# Altium PCB USB-PD-240W-PCB.PcbDoc (part 1 of 3)
Units mil, origin at the board's own origin, x right, y up, seen from the top; angles counter-clockwise.
Board outline 3858.27 x 2834.65 mil, 6 copper layers (L1 Top, L2 GND, L3 Power, L4 Power, L5 GND, L6 Bottom), stack 61.496 mil thick; 154 components, 83 nets, 633 pads, 831 vias.
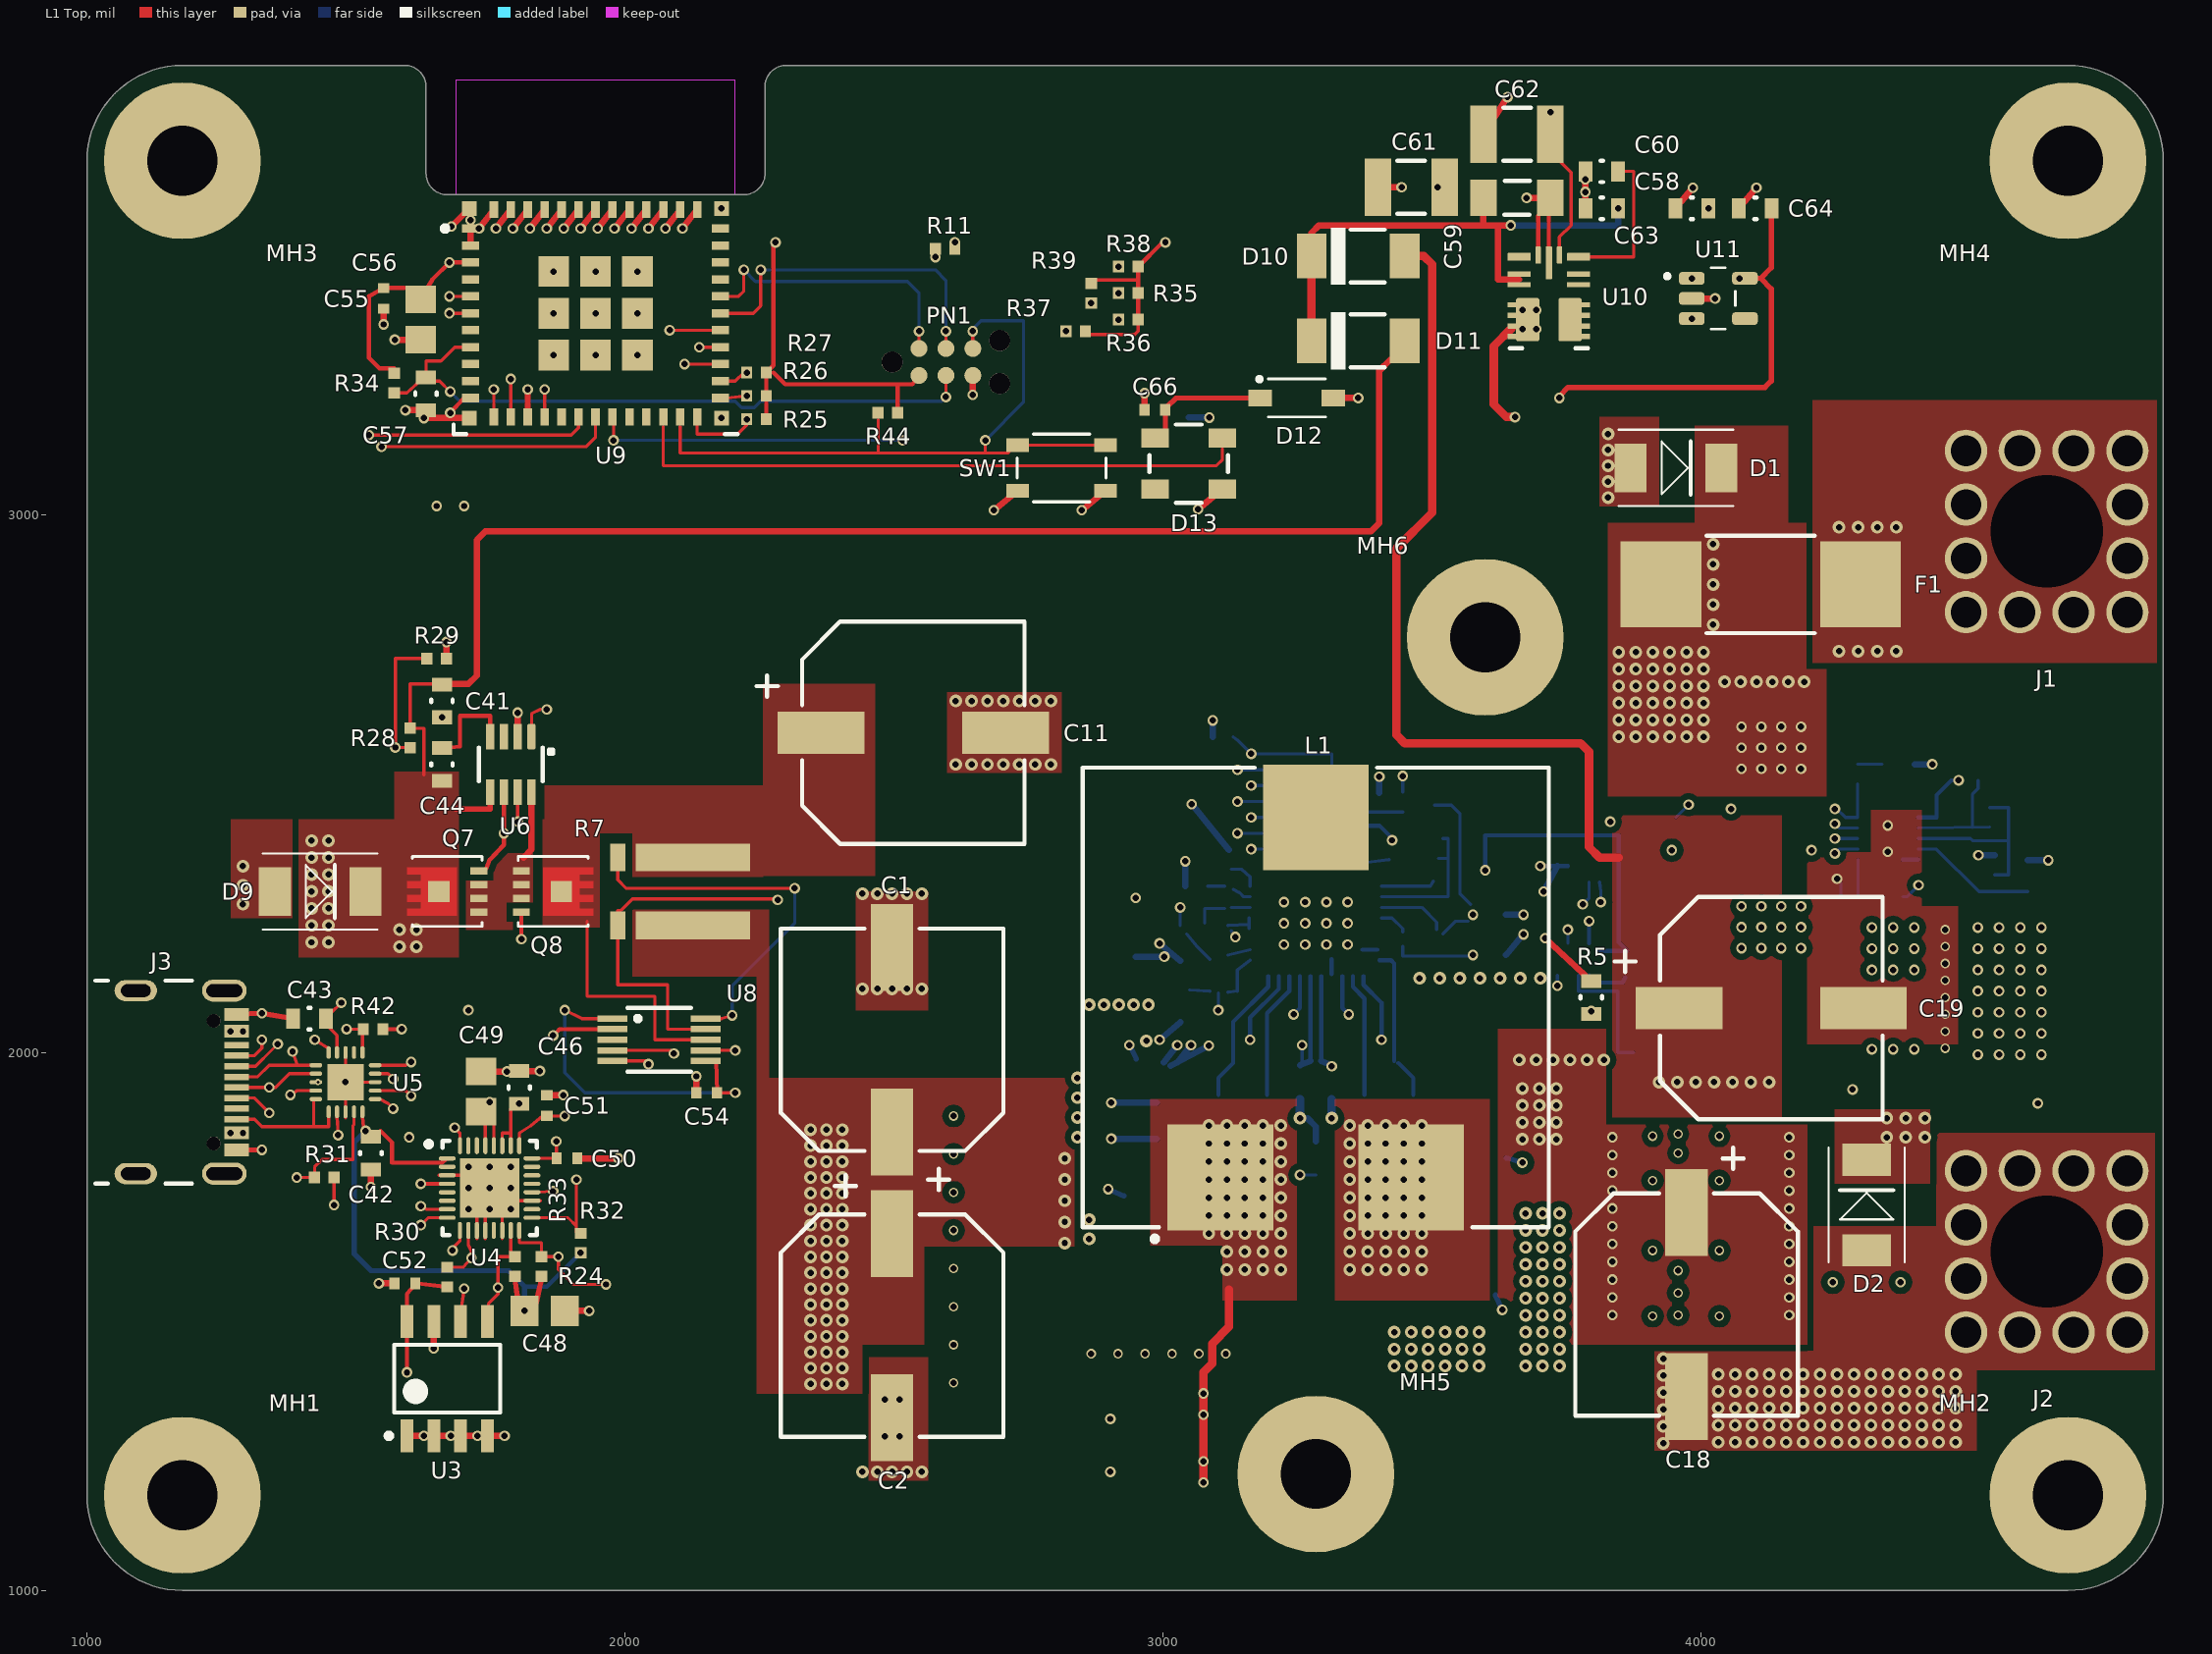
[diagram p0: L1 Top view]
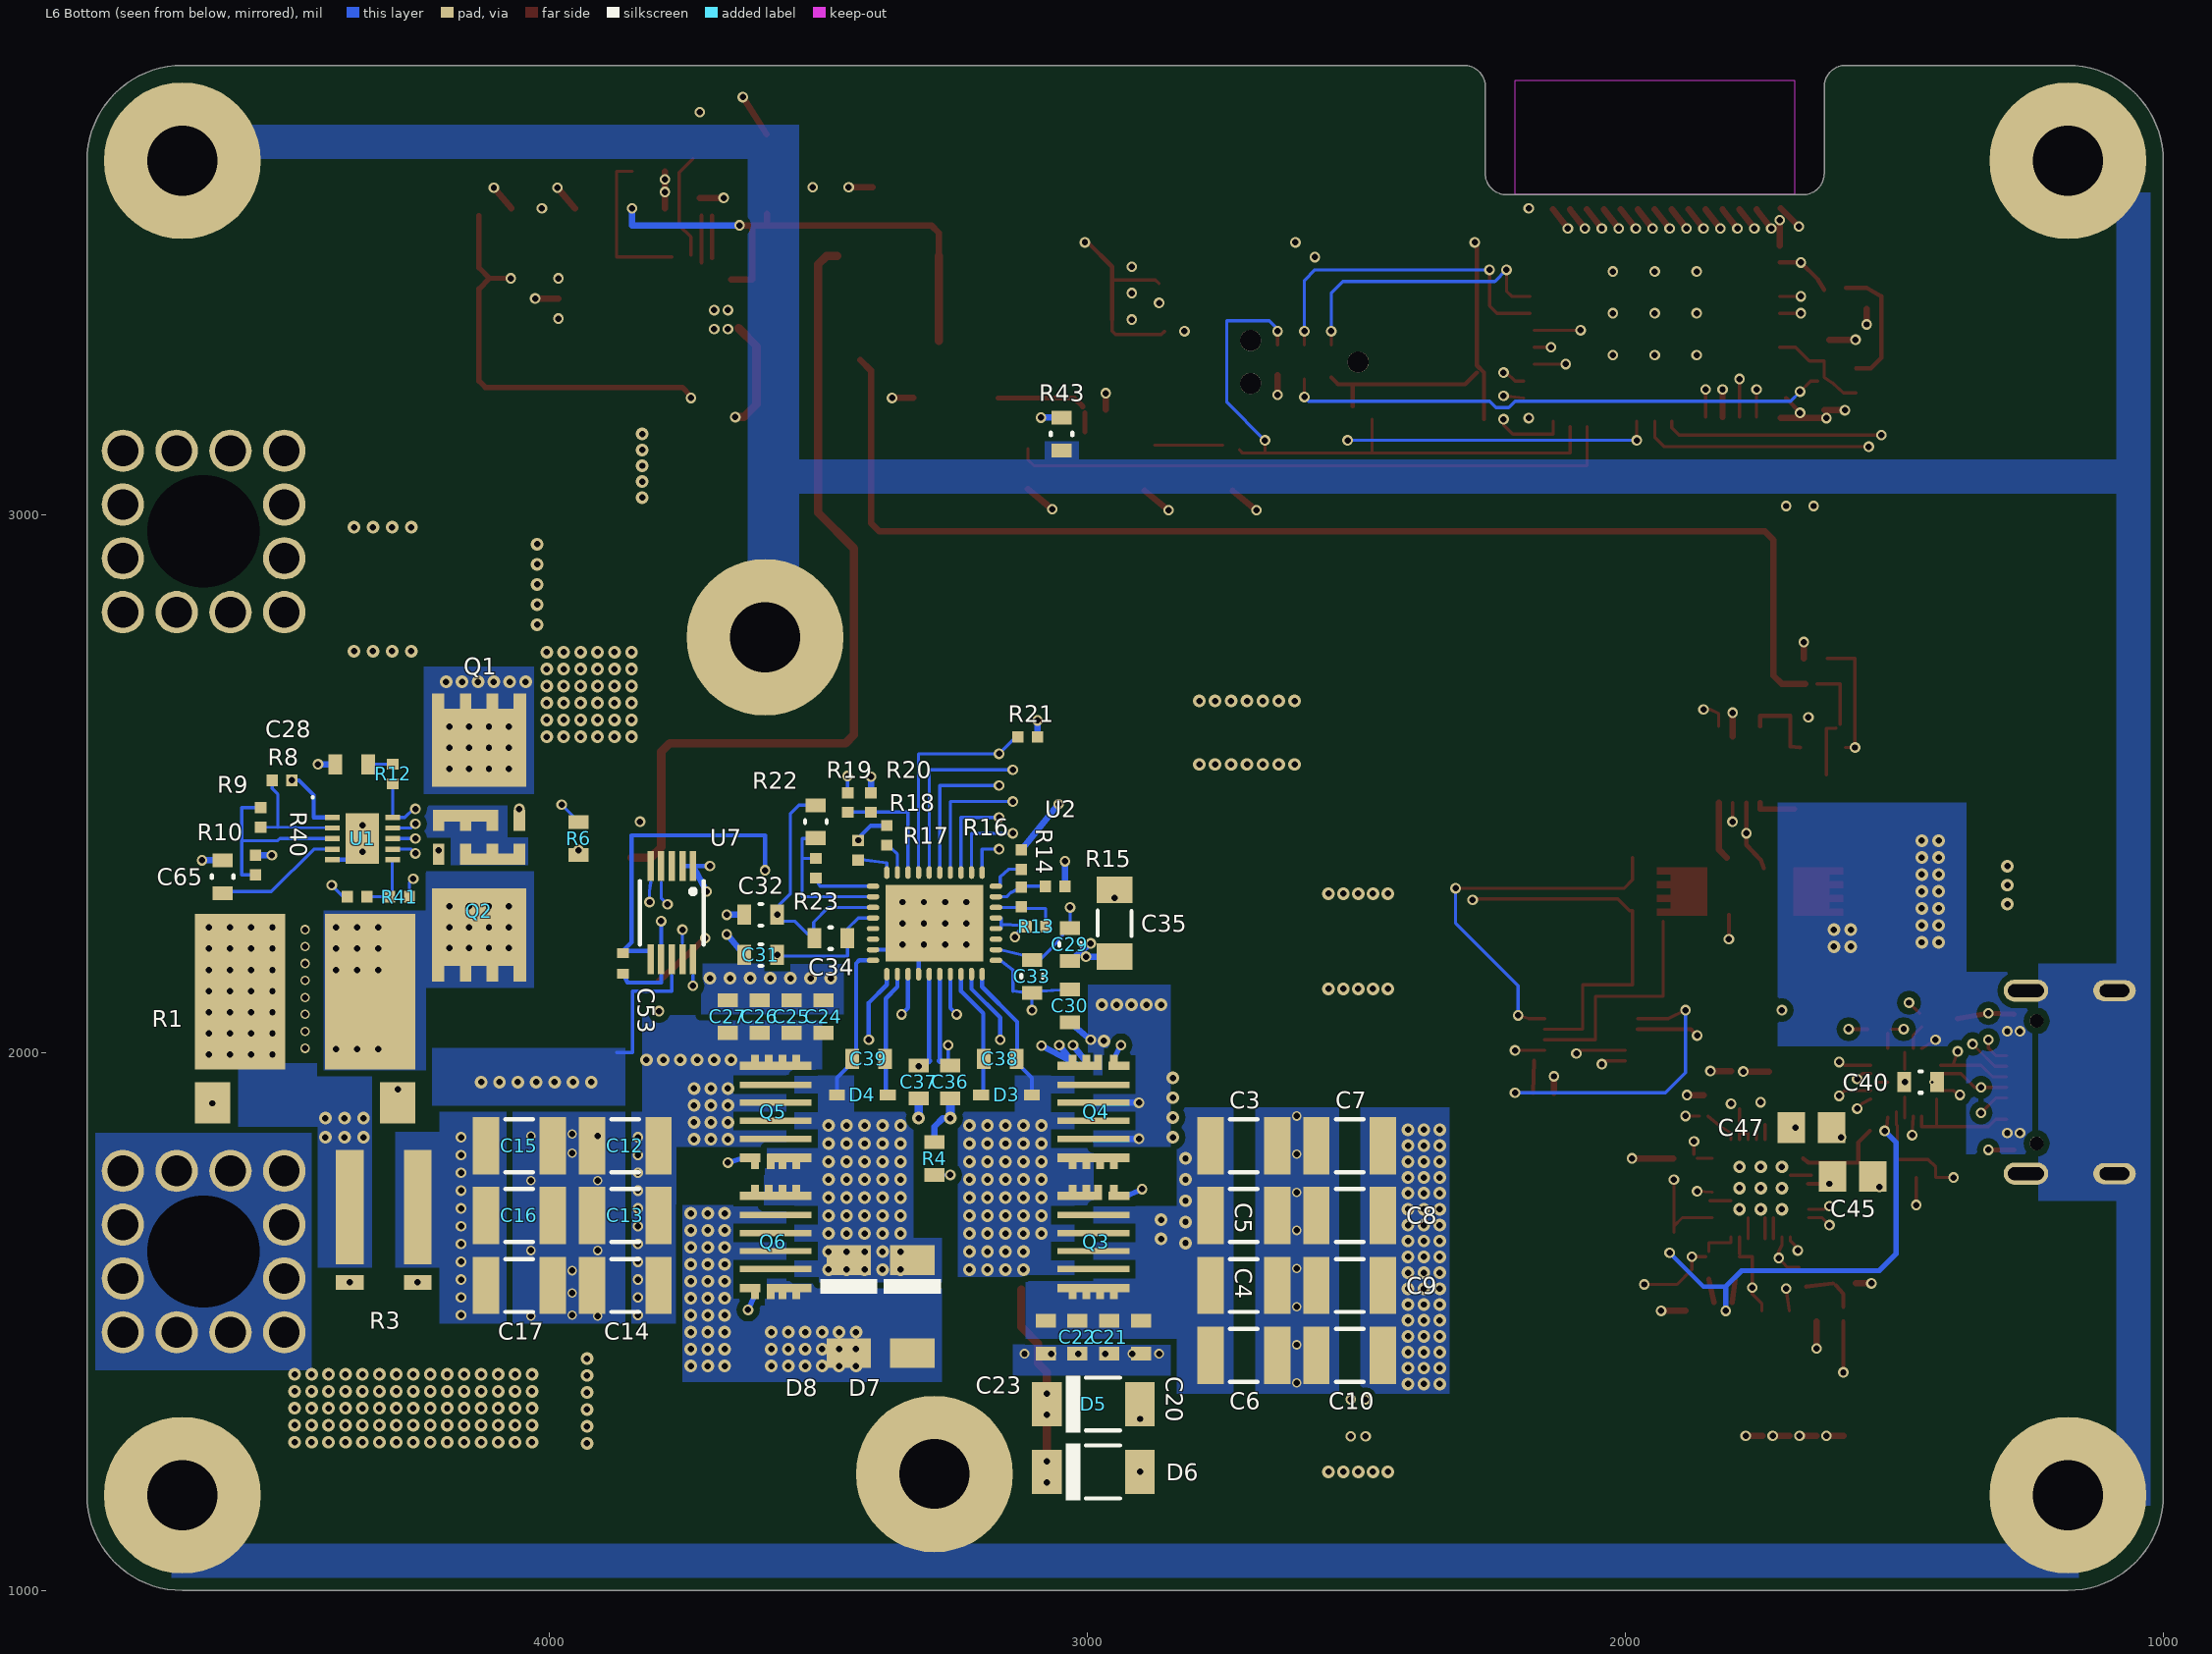
[diagram p1: L6 Bottom view, seen from below]
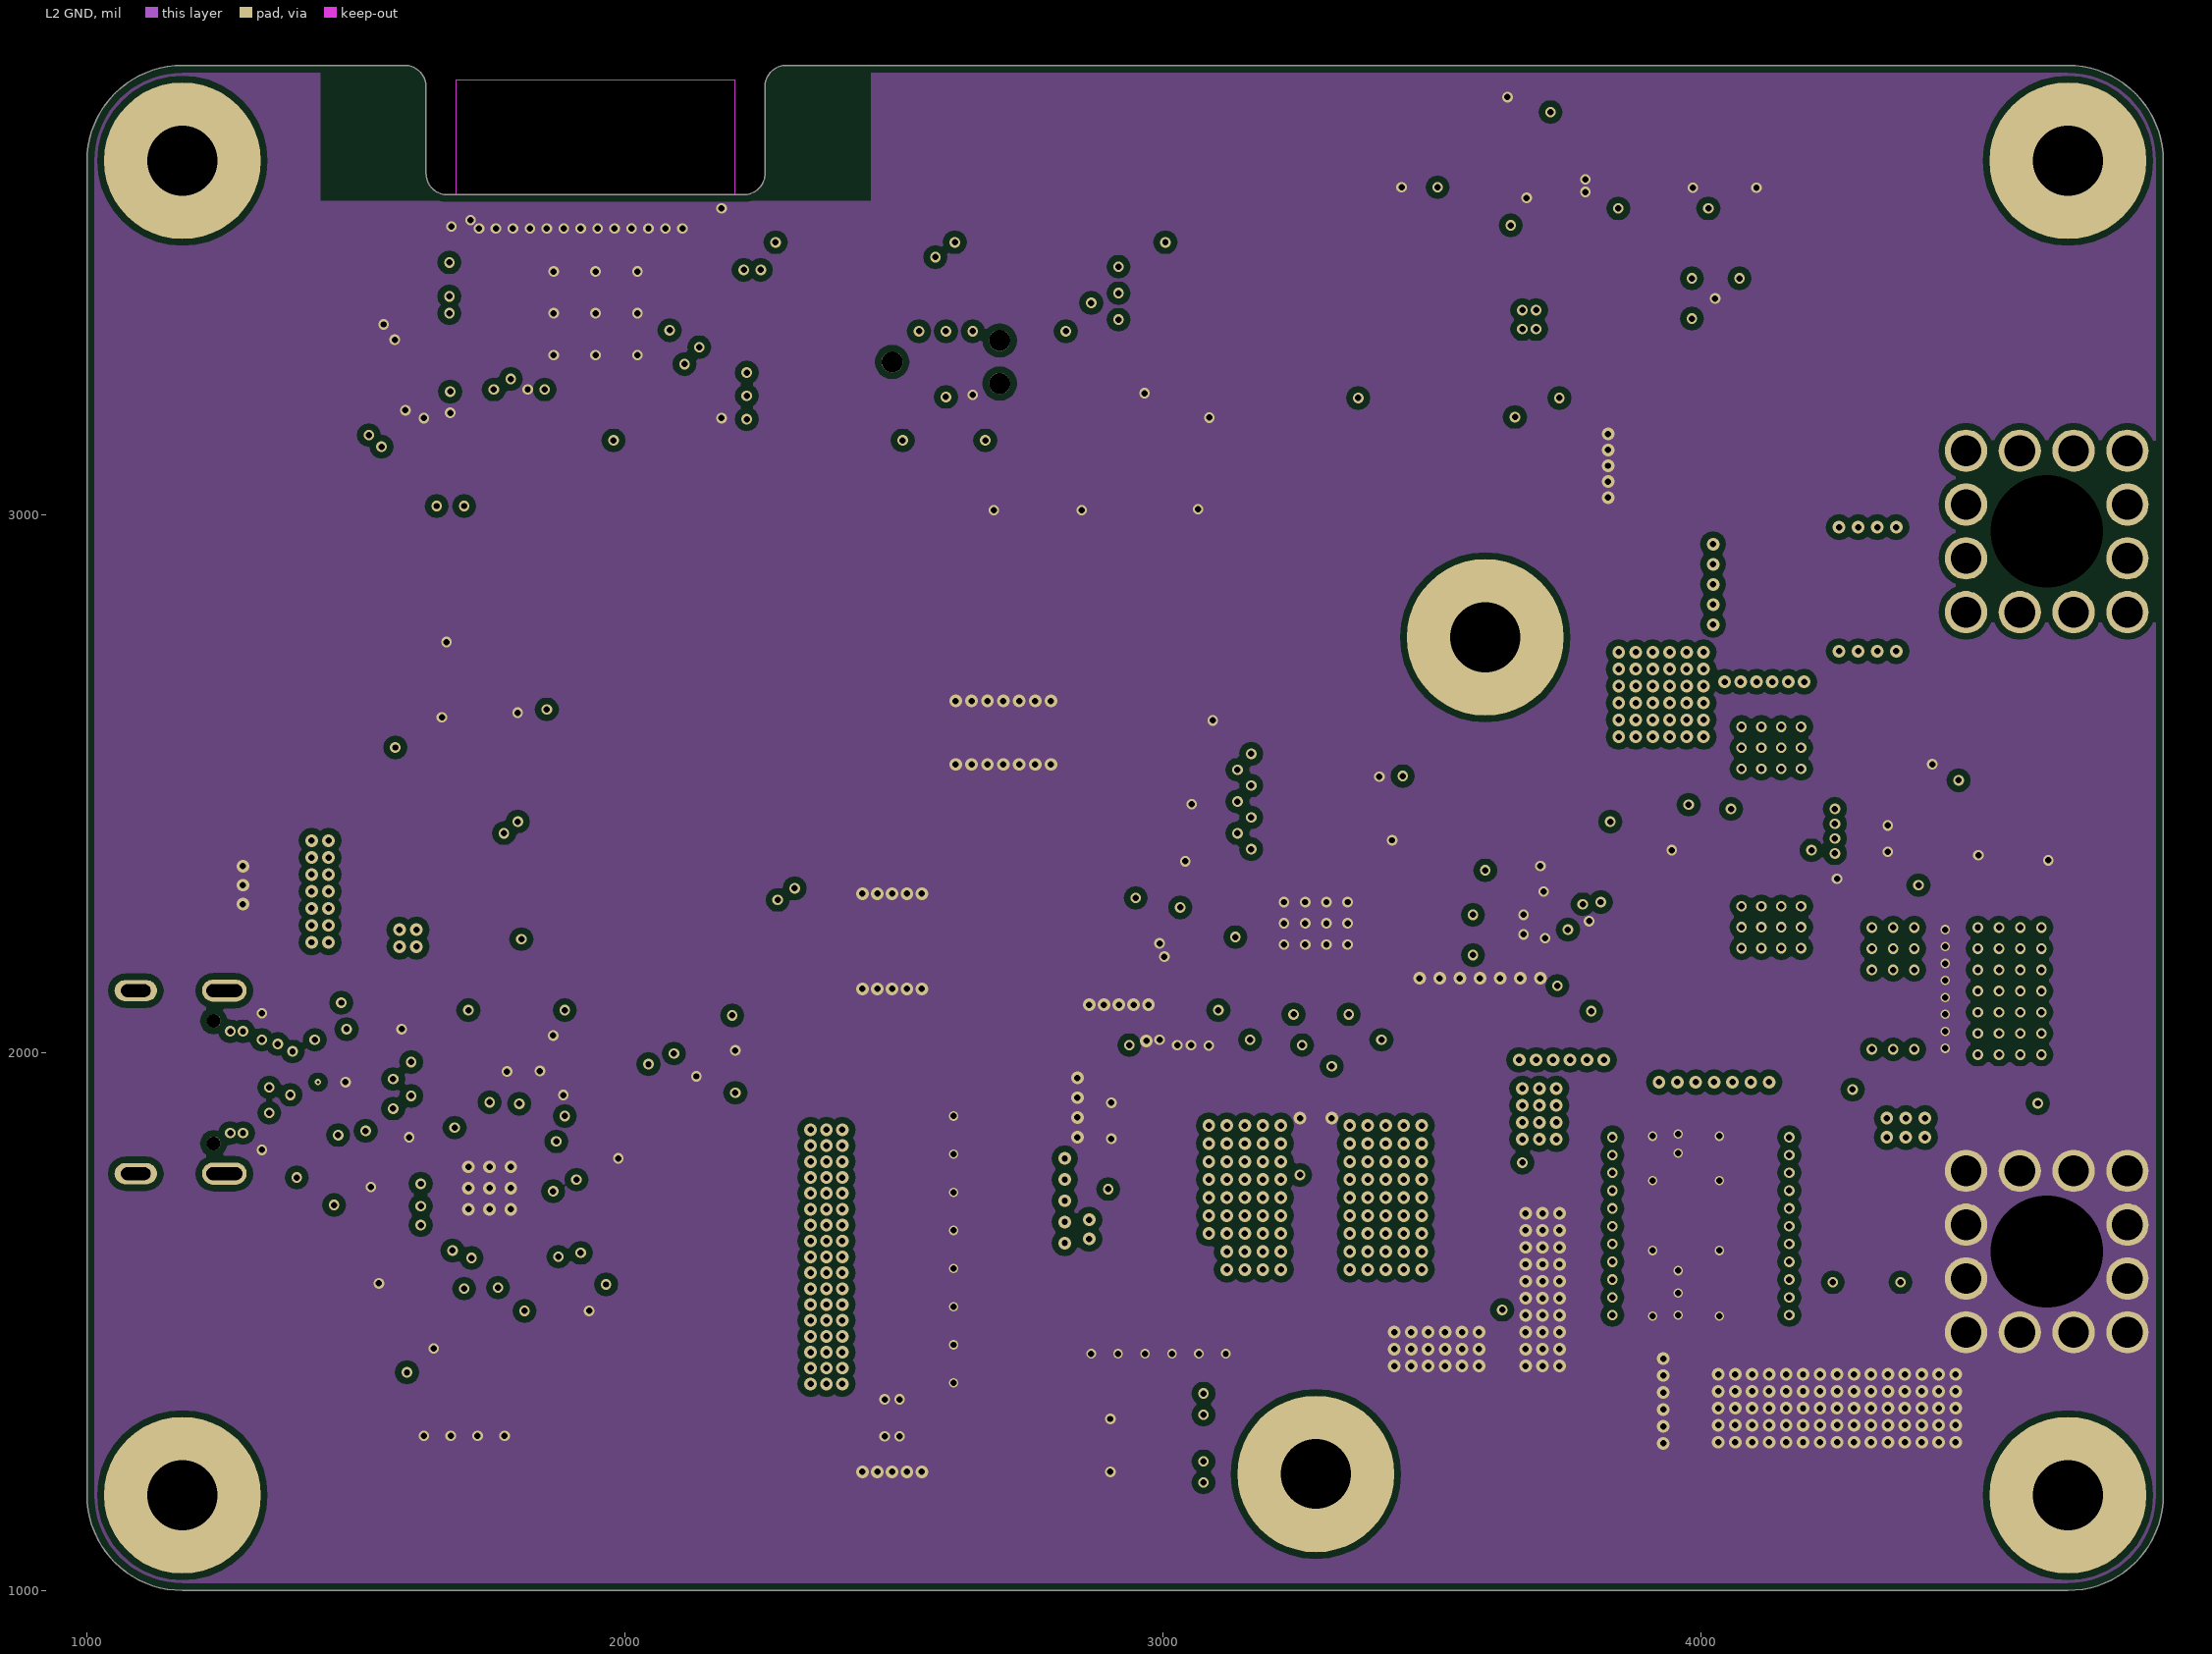
[diagram p2: L2 GND]
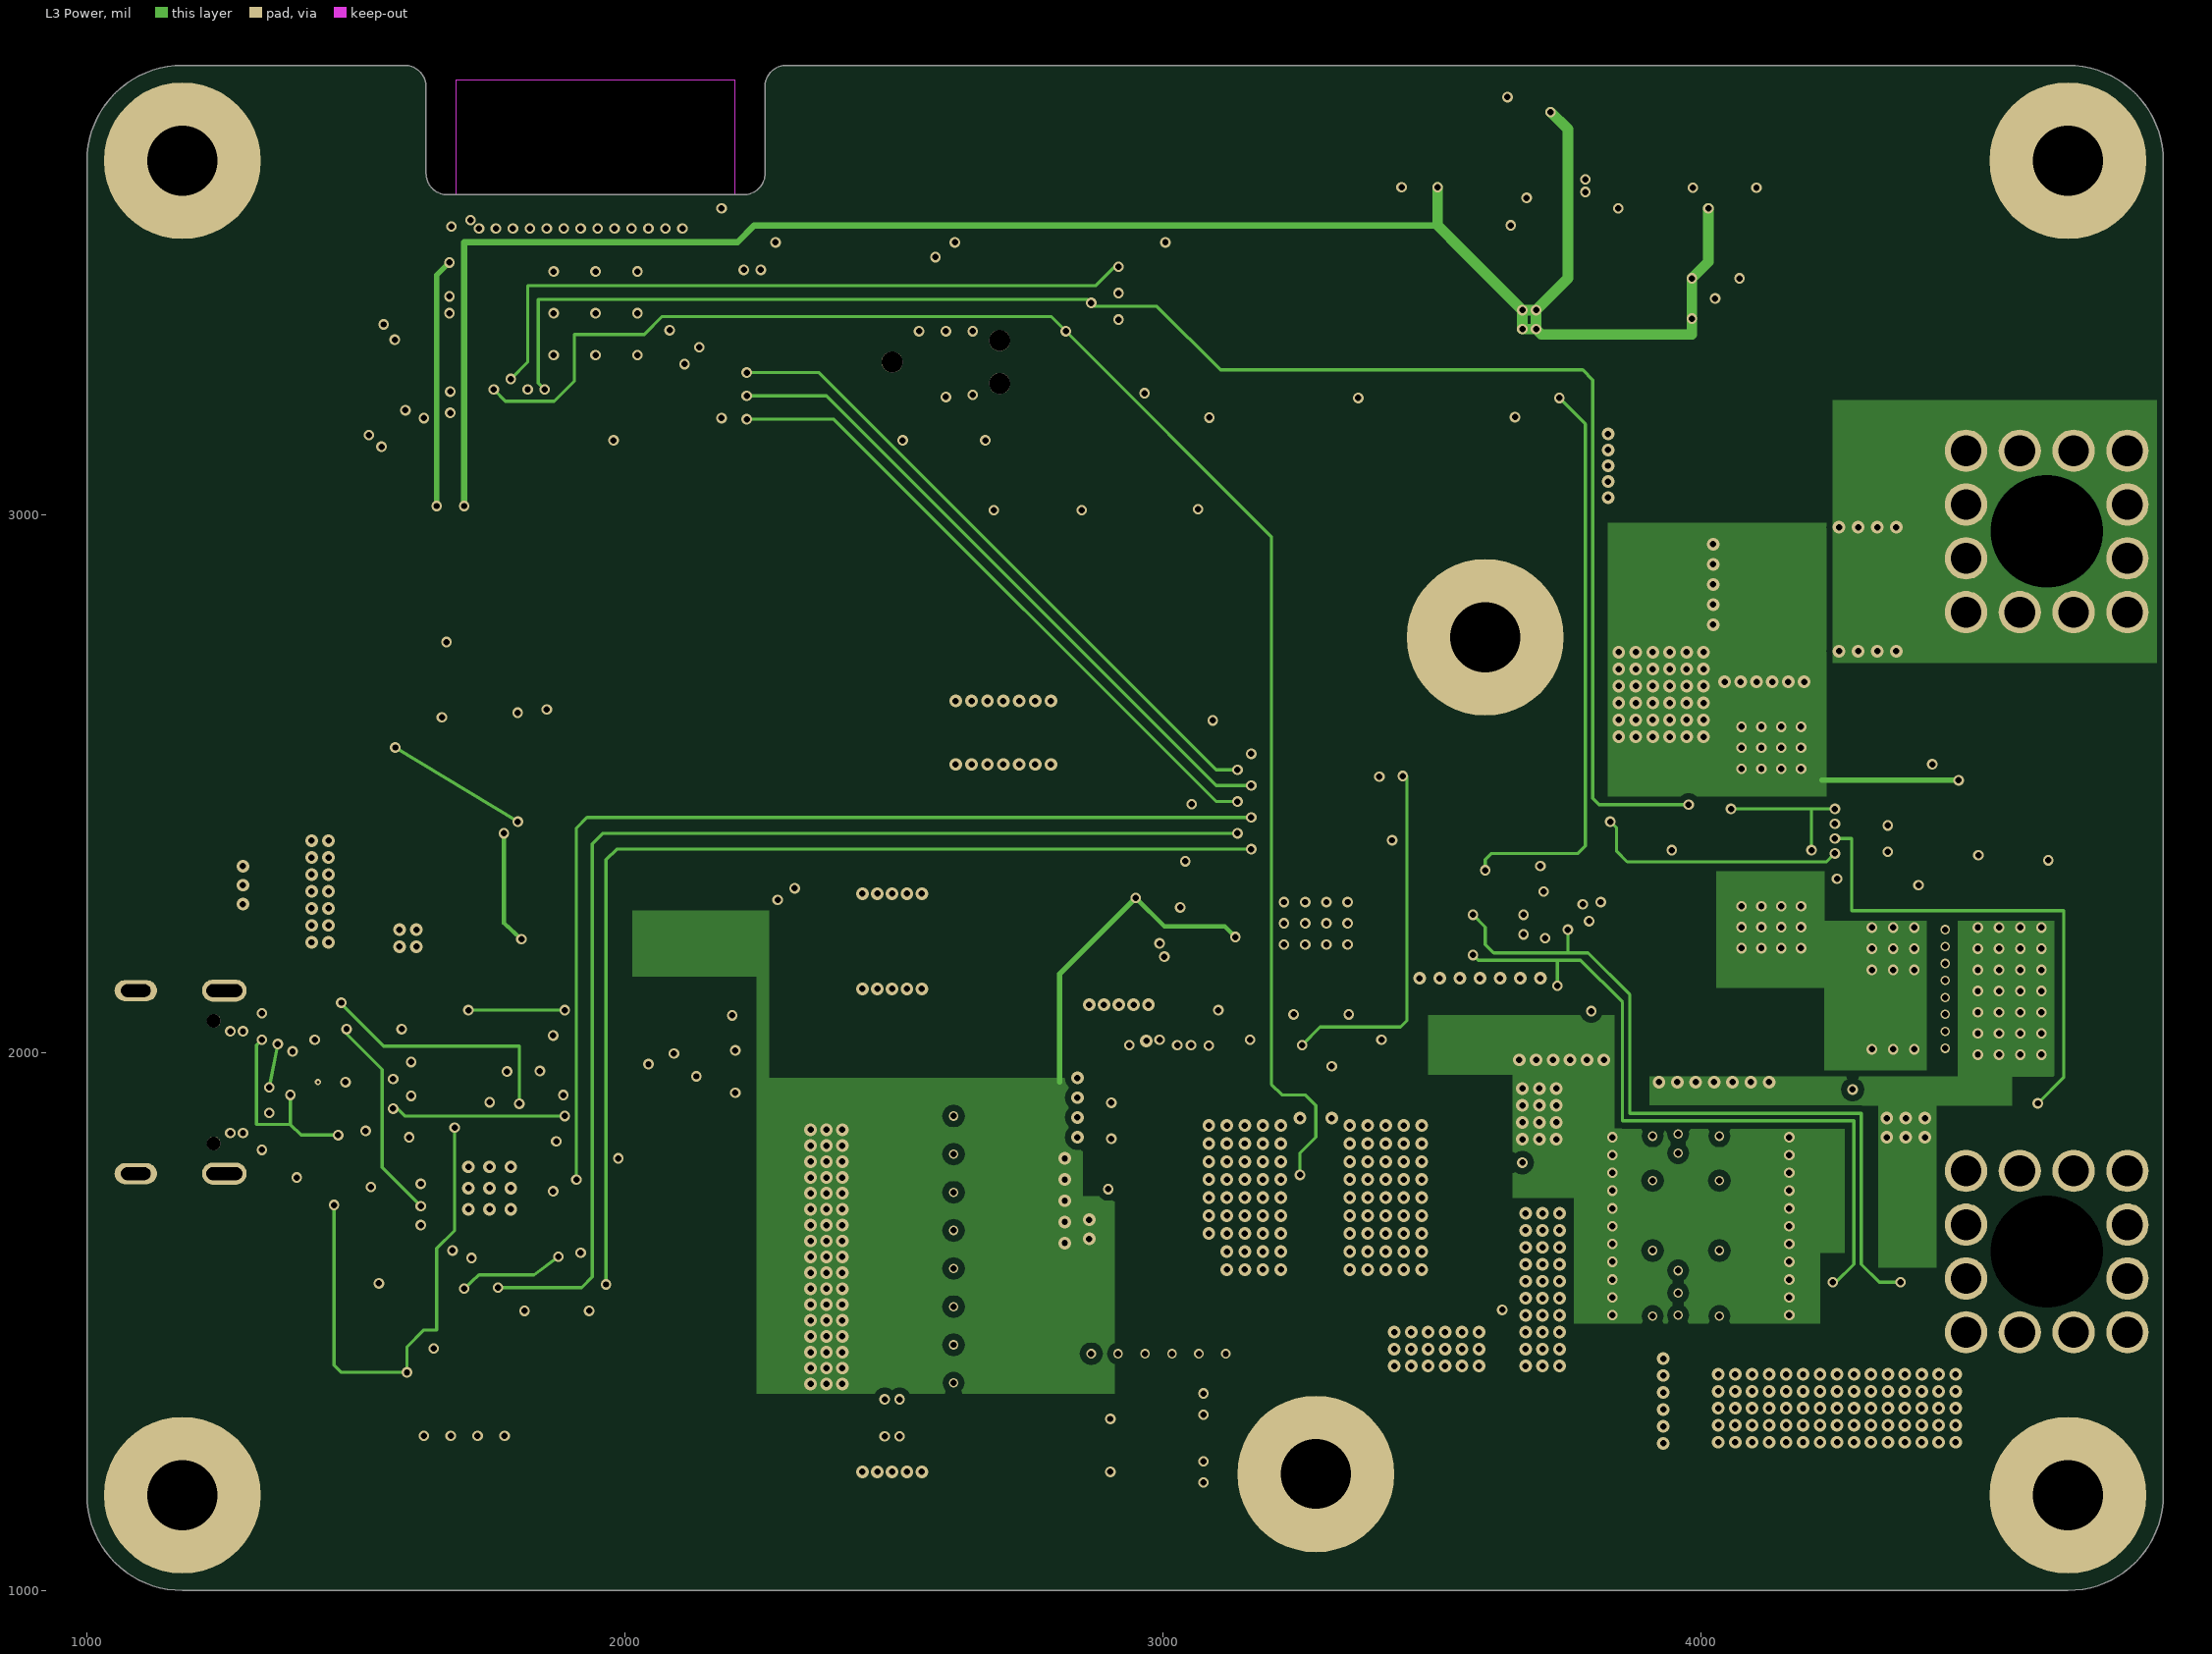
[diagram p3: L3 Power]
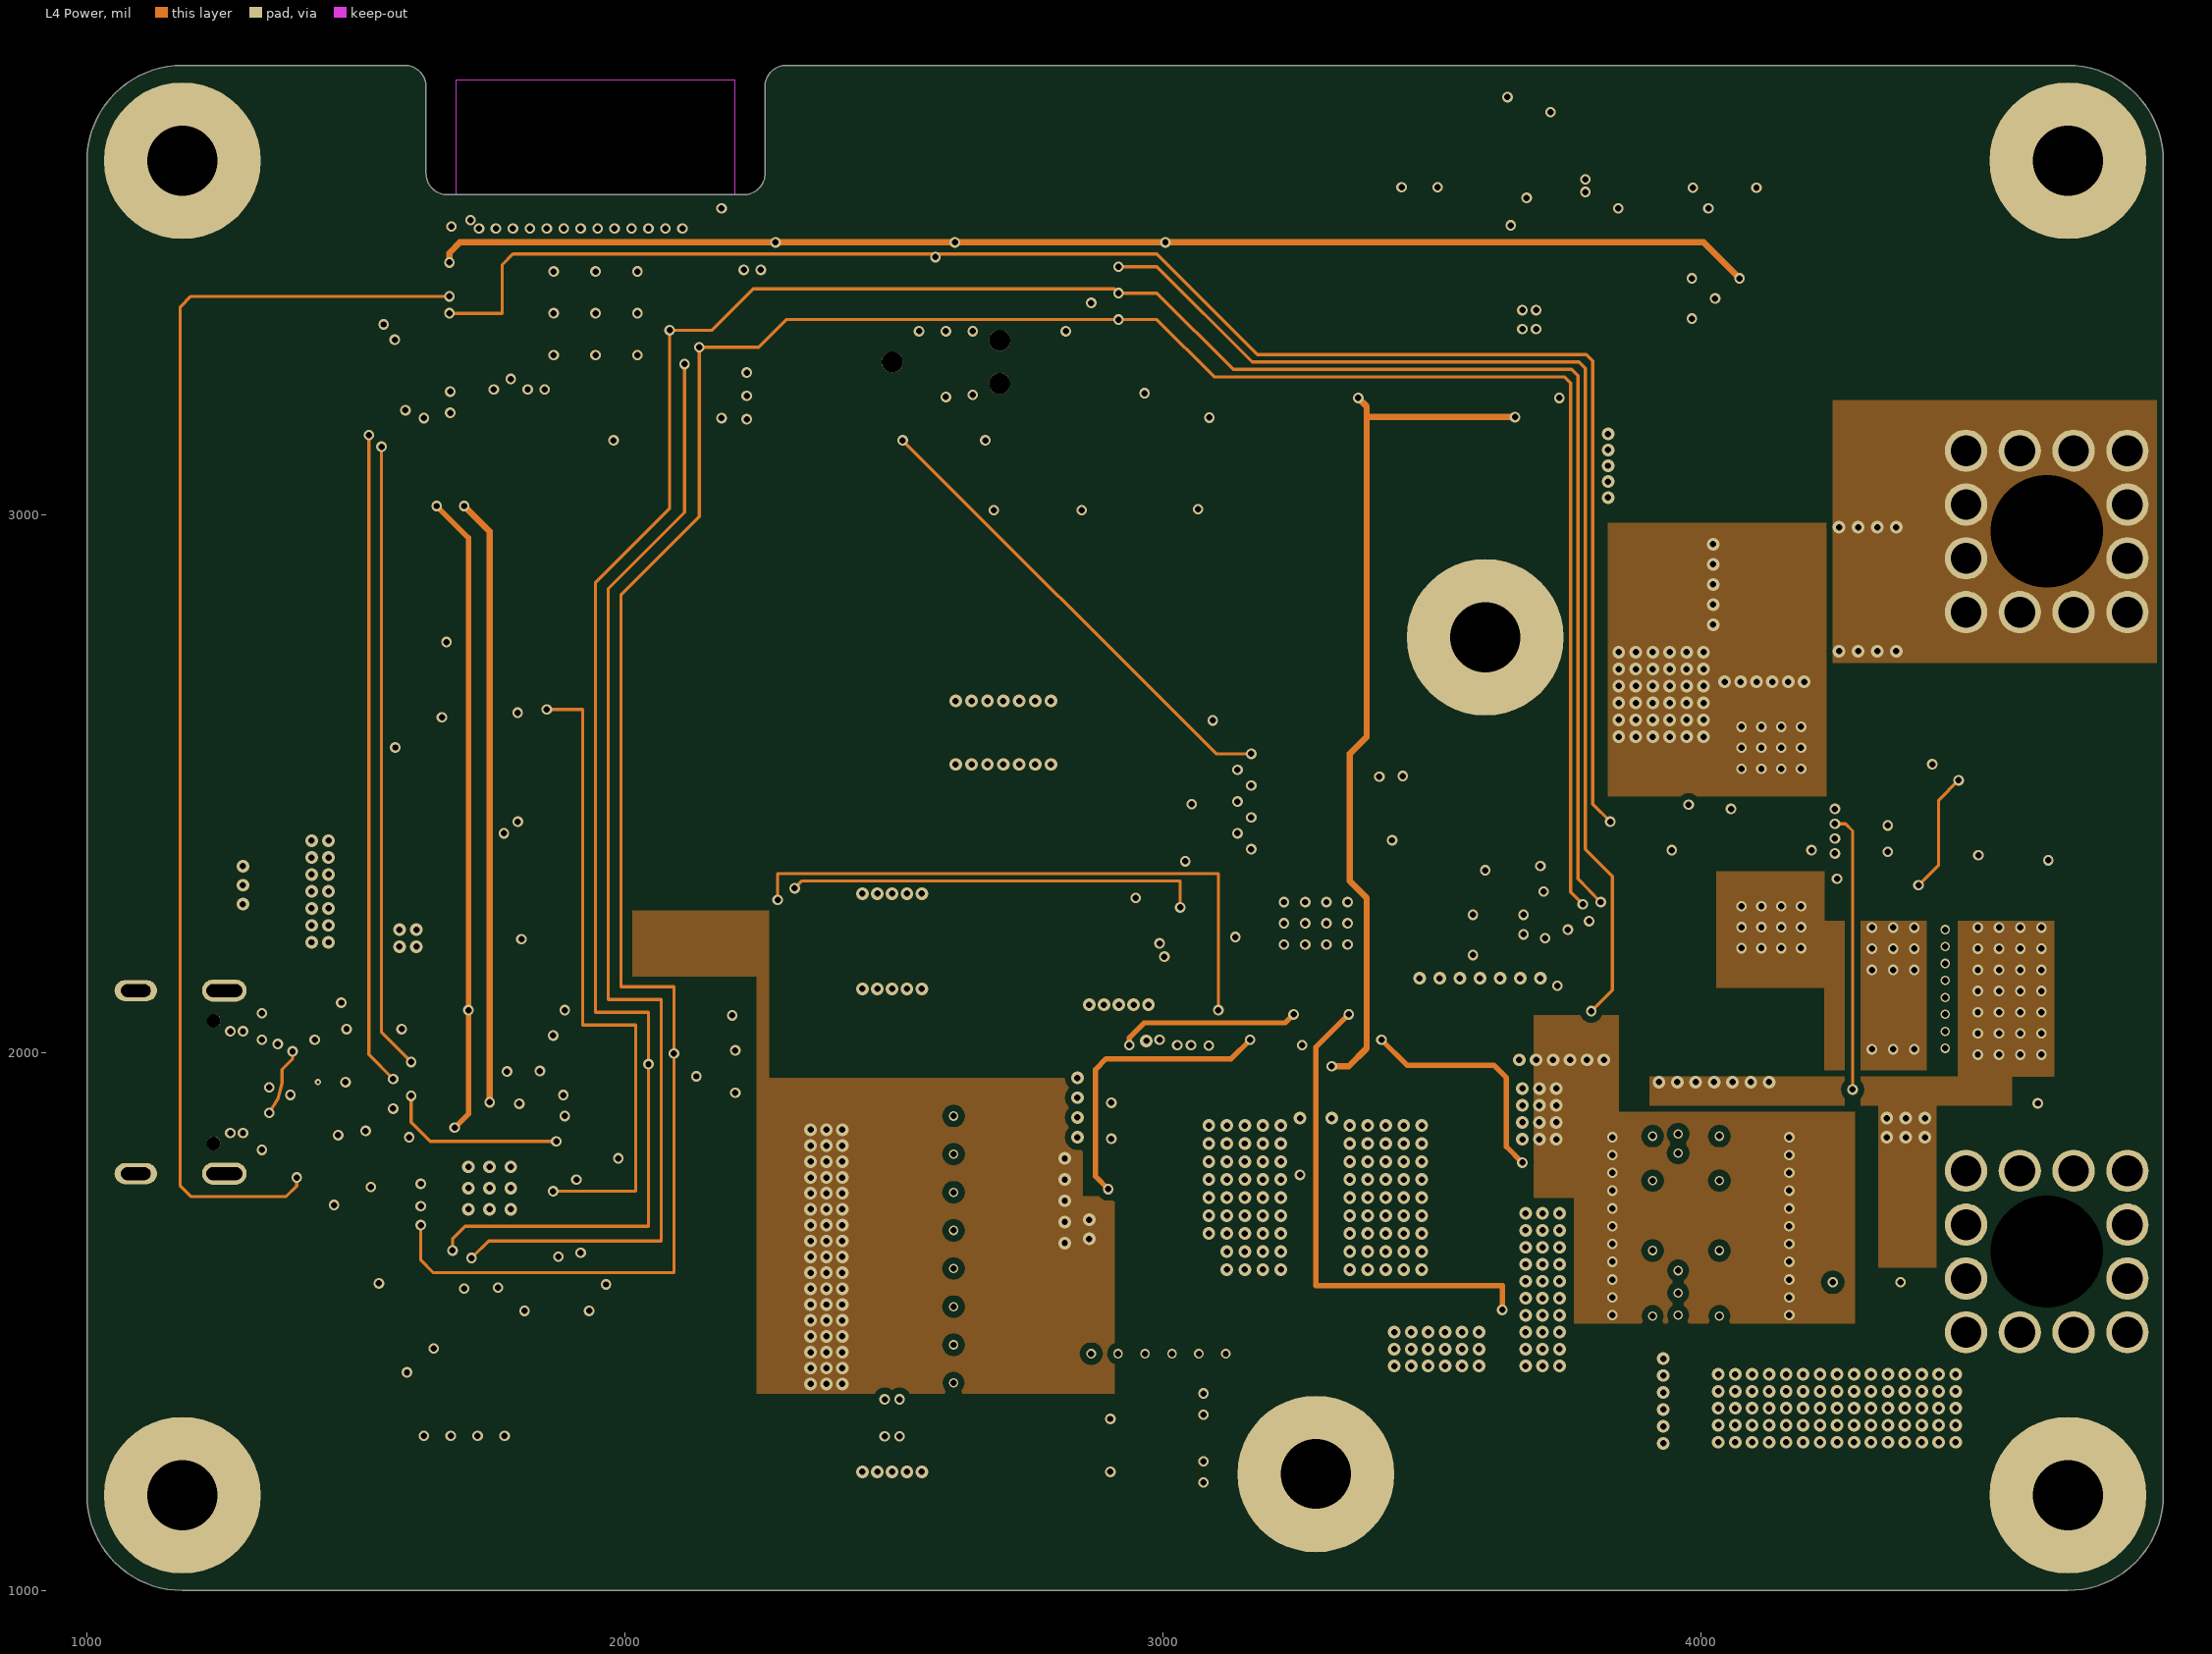
[diagram p4: L4 Power]
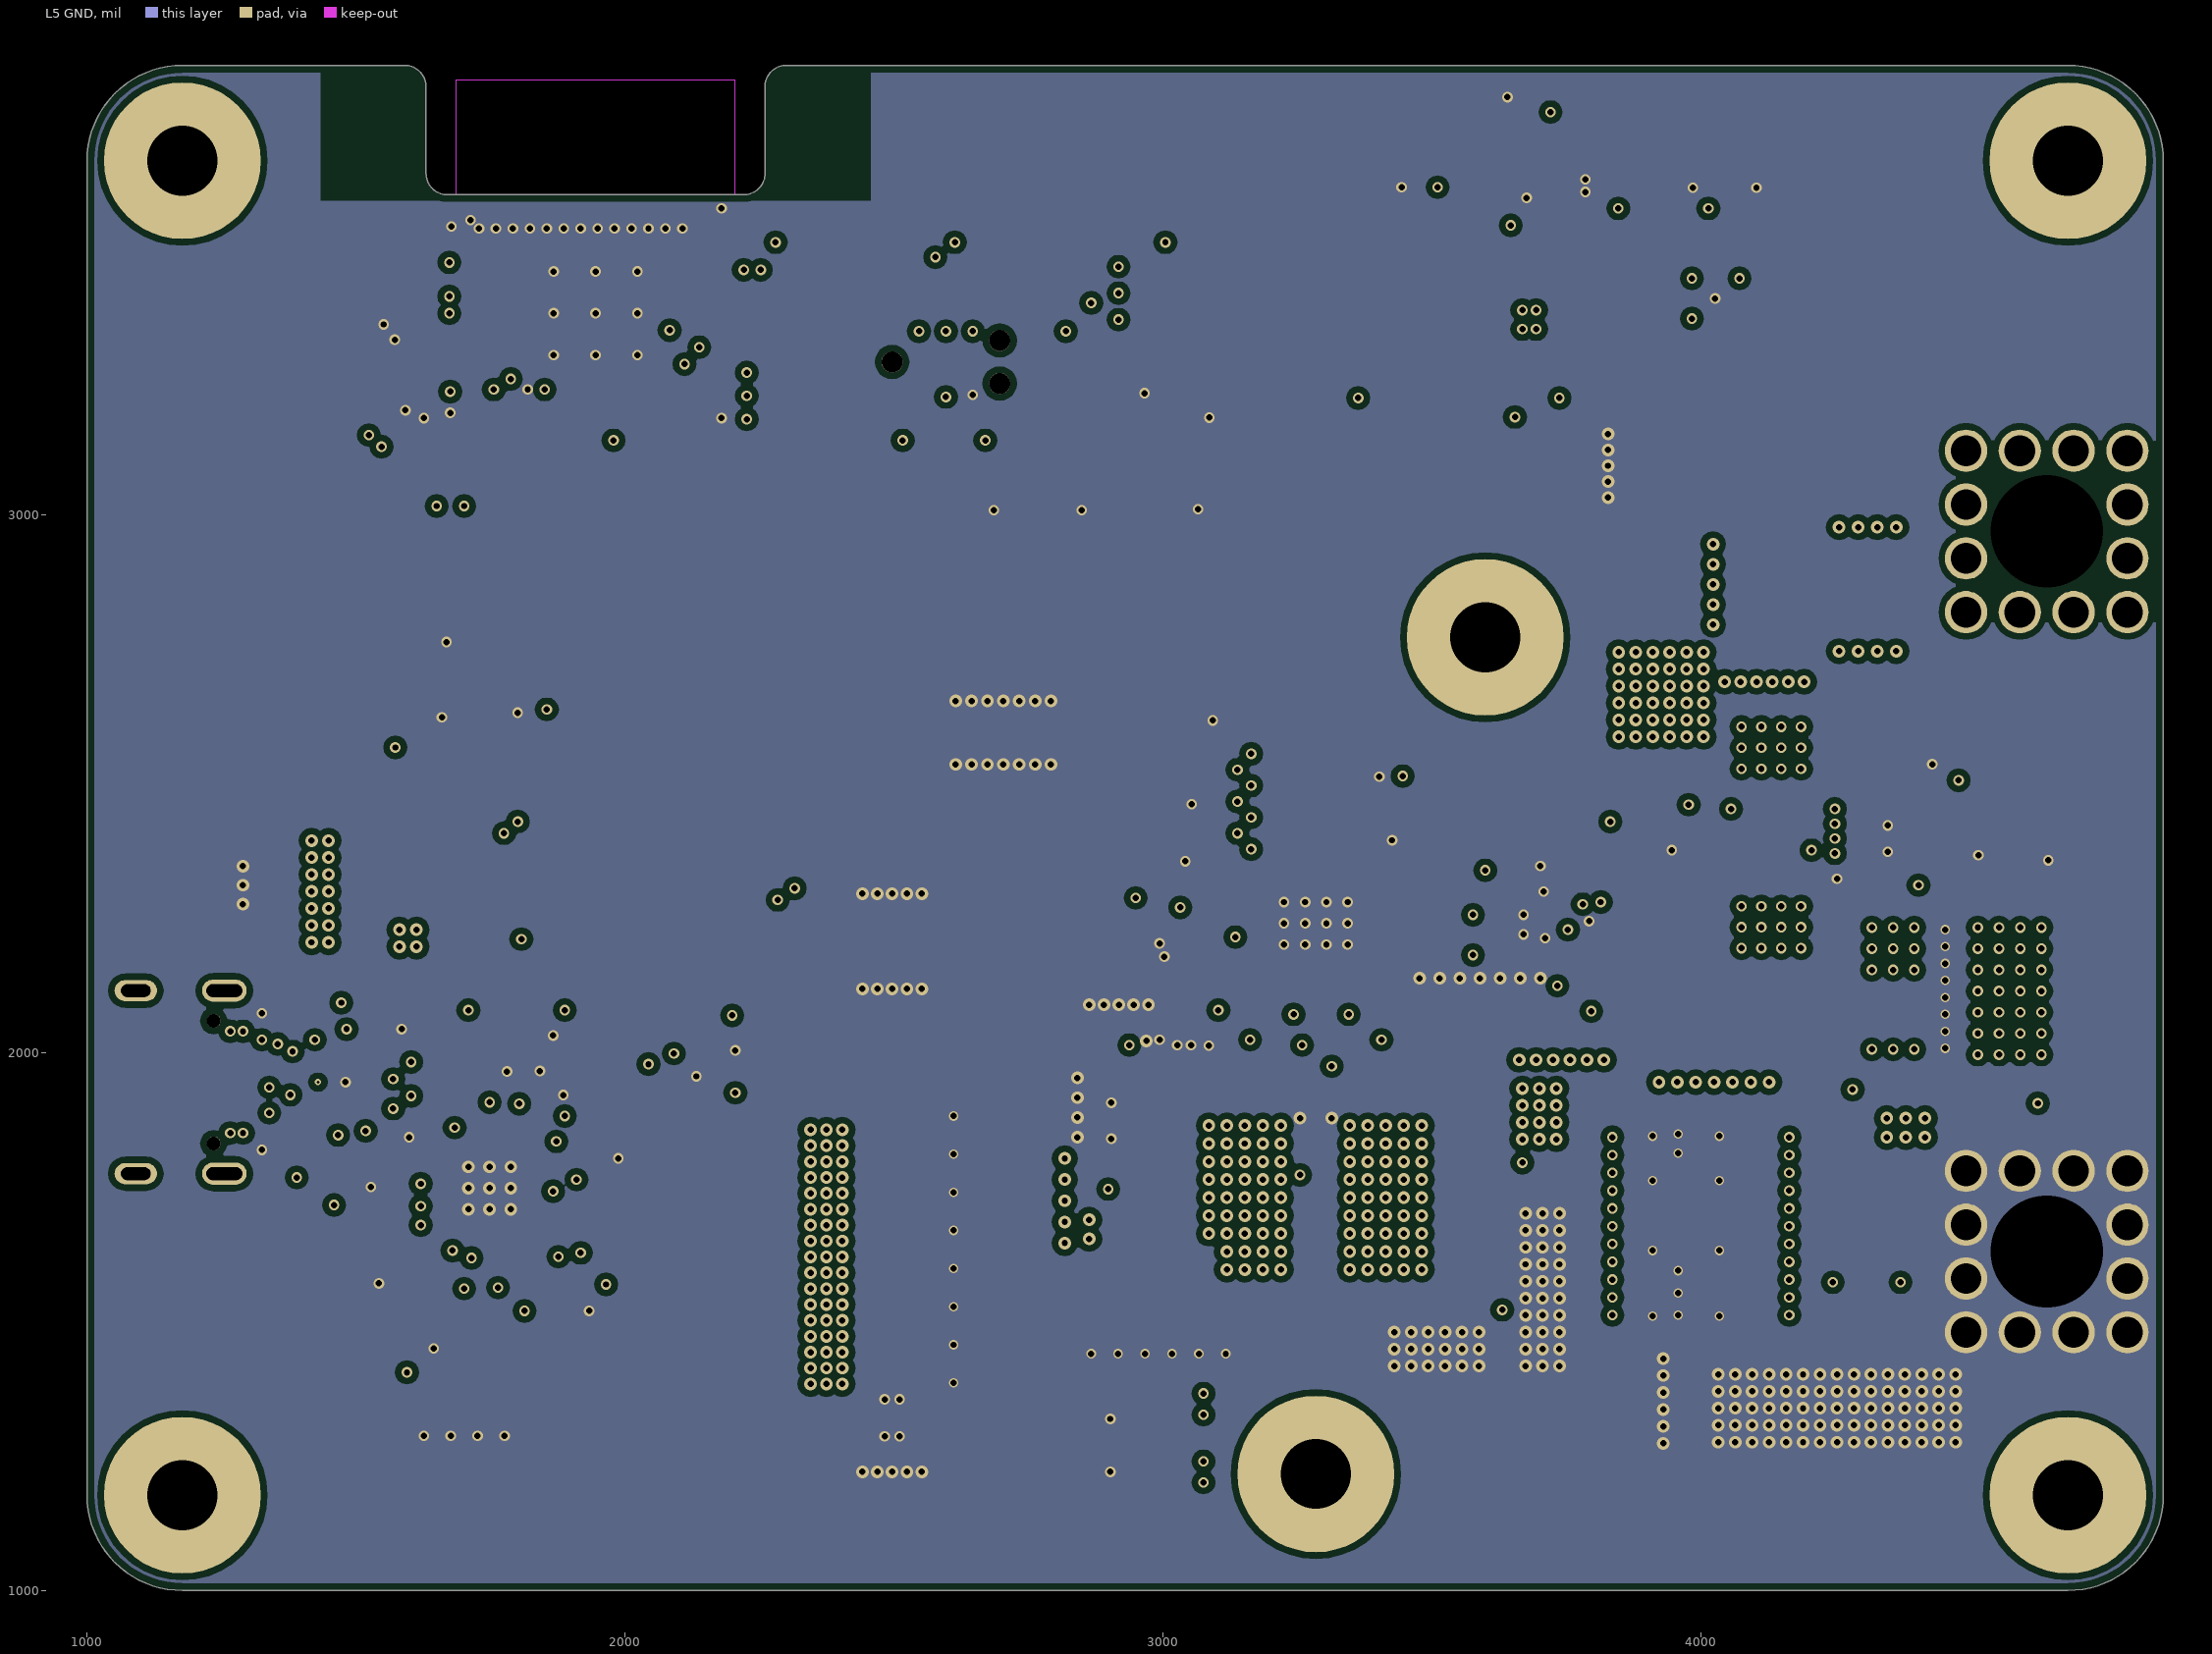
[diagram p5: L5 GND]
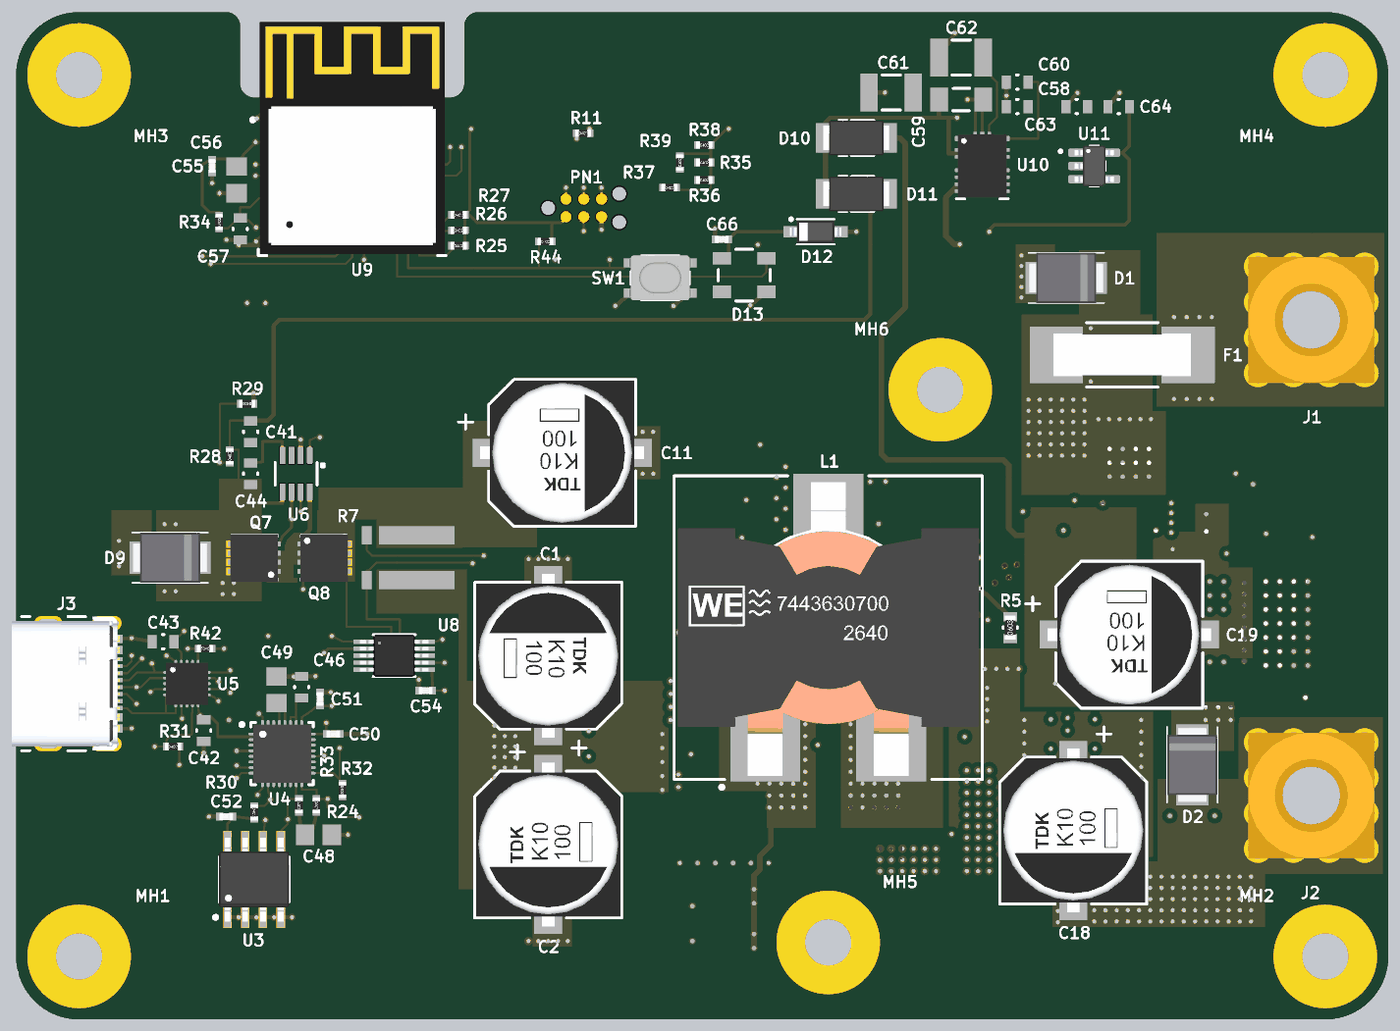
[diagram p7: 3D render of the assembled board from above, using the file's embedded part models]

## Layer stack, top to bottom
Top Solder: solder mask 0.4, Solder Resist, Dk 3.5
L1 Top: signal copper 2.7559
Dielectric 1: prepreg 3.622, NP-155F, Dk 4.1
L2 GND: signal copper 1.1811
Dielectric 2: core 17.7165, NP-155F, Dk 4.36
L3 Power: signal copper 1.1811
Dielectric 3: prepreg 4.2913, NP-155F, Dk 4.16
Dielectric 4: prepreg 4.2913, NP-155F, Dk 4.16
L4 Power: signal copper 1.1811
Dielectric 5: core 17.7165, NP-155F, Dk 4.36
L5 GND: signal copper 1.1811
Dielectric 6: prepreg 3.622, NP-155F, Dk 4.1
L6 Bottom: signal copper 2.7559
Bottom Solder: solder mask 0.4, Solder Resist, Dk 3.5

## Board outline
1177.17,1000 cw(c1177.17,1177.17) 1000,1177.17 1000,3657.48 cw(c1177.17,3657.48) 1177.17,3834.65 1590.55,3834.65 cw(c1590.55,3795.28) 1629.92,3795.28 1629.92,3633.86 ccw(c1669.29,3633.86) 1669.29,3594.49 2220.47,3594.49 ccw(c2220.47,3633.86) 2259.84,3633.86 2259.84,3795.28 cw(c2299.21,3795.28) 2299.21,3834.65 4681.1,3834.65 cw(c4681.1,3657.48) 4858.27,3657.48 4858.27,1177.17 cw(c4681.1,1177.17) 4681.1,1000

## Design rules (kind name [scope] priority, off if disabled: settings)
BoardOutlineClearance [All] p1: gap=11.81 ignorepadtopadclearanceinfootprint=FALSE // JLCPCB copper to routed edge 0.2 mm minimum
Clearance "Clearance J3" [InComponent('J3') Or InComponent('U4') Or InComponent('U5') vs (IsVia Or IsTrack) And Not InPolygon] p1: gap=3.94 ignorepadtopadclearanceinfootprint=FALSE
Clearance "Clearance Polygon" [InPolygon] p2: gap=11.81 ignorepadtopadclearanceinfootprint=TRUE // Nets above 30 V (to 58.4 V). IPC-2221B 51-100 V: 0.13 mm under mask, 0.25 mm exposed terminations
Clearance [All] p3: gap=7.87 ignorepadtopadclearanceinfootprint=TRUE // JLCPCB 2 oz multilayer minimum 0.15 mm; polygons 0.3 mm
ComponentClearance [All] p1: gap=9.84 collisioncheckmode=3 verticalgap=9.84 showdistances=FALSE
Height "Height Bottom" [OnBottomLayer] p1: minheight=0 maxheight=118.11 prefheight=39.37 // Bottom side faces the heatsink: 3.5 mm body clearance
Height [All] p2: minheight=0 maxheight=590.55 prefheight=503.94 // Tallest part L1 14.5 mm
HoleSize [All] p1: absolutevalues=TRUE maxlimit=248.03 minlimit=5.91 maxpercent=80.000 minpercent=20.000 // Project minimum 0.3 mm (JLCPCB 0.15-6.3 mm)
HoleToHoleClearance [All] p1: gap=9.84 allowstackedmicrovias=TRUE // JLCPCB via-to-via 0.2 mm
MinimumSolderMaskSliver [All] p1: minsoldermaskwidth=3.94 // JLCPCB minimum dam 0.1 mm (green)
PlaneClearance [All] p1: clearance=11.81
PlaneConnect [All] p1: planeconnectstyle=Relief reliefexpansion=19.68 reliefentries=4 reliefconductorwidth=11.81 reliefairgap=9.84
PolygonConnect "PolygonConnect Power" [InNetClass('POWER') Or InNet('GND') Or InNet('CHS') Or IsVia] p1: connectstyle=Direct reliefconductorwidth=19.68 reliefentries=4 polygonreliefangle="90 Angle" airgapwidth=11.81 // Direct for SMD and vias; wide spokes on through-hole terminals
PolygonConnect [All] p2: thpad.connectstyle=Relief thpad.reliefconductorwidth=11.81 thpad.reliefentries=4 thpad.polygonreliefangle="90 Angle" thpad.airgapwidth=9.84 smdpad.connectstyle=Relief smdpad.reliefconductorwidth=11.81 smdpad.reliefentries=4 smdpad.polygonreliefangle="90 Angle" smdpad.airgapwidth=9.84 via.connectstyle=Direct via.reliefconductorwidth=11.81 via.reliefentries=4 via.polygonreliefangle="90 Angle" via.airgapwidth=9.84 // Reliefs for hand rework on 2 oz
RoutingLayers [All] p1: top layer_v5=TRUE mid layer 1_v5=FALSE mid layer 2_v5=TRUE mid layer 3_v5=TRUE mid layer 4_v5=FALSE bottom layer_v5=TRUE
RoutingVias "RoutingVias Power" [InNetClass('POWER')] p1: holewidth=15.75 width=31.5 viastyle="Through Hole" minholewidth=11.81 minwidth=23.62 maxholewidth=23.62 maxwidth=47.24 // About 1.5 A per via at 2 oz
RoutingVias [All] p2: holewidth=11.81 width=23.62 viastyle="Through Hole" minholewidth=11.81 minwidth=17.72 maxholewidth=23.62 maxwidth=47.24 // Project minimum 0.3/0.45 mm (JLCPCB 0.15/0.25 mm)
SilkToSilkClearance [All] p1: silktosilkclearance=5.91
SilkToSolderMaskClearance [IsPad] p1: minsilkscreentomaskgap=5.91 clearancetoexposedcopper=TRUE // JLCPCB silk to pad 0.15 mm
SolderMaskExpansion [Not (InComponent('J3') Or InComponent('U4') Or InComponent('U7') Or InComponent('U8'))] p1: expansion=1.97 istentingtop=FALSE
SolderMaskExpansion "SolderMaskExpansion FinePitch" [InComponent('J3') Or InComponent('U4') Or InComponent('U7') Or InComponent('U8')] p2: expansion=0.98 istentingtop=FALSE
SolderMaskExpansion SolderMaskExpansionVia [IsVia] p3: expansion=1.97 istentingtop=TRUE // Tented vias
SolderMaskExpansion "SolderMaskExpansion FinePitch" [InComponent('J3') Or InComponent('U4') Or InComponent('U7') Or InComponent('U8')] p4: expansion=0.98 istentingtop=FALSE
SupplyNets "Schematic Supply Nets_8" [InNet('PD_LDO_3V3')] p1: voltage=0.000
SupplyNets "Schematic Supply Nets_7" [InNet('VBUS')] p2: voltage=0.000
SupplyNets "Schematic Supply Nets_6" [InNet('+5V')] p3: voltage=0.000
SupplyNets "Schematic Supply Nets_5" [InNet('V_BAT')] p4: voltage=0.000
SupplyNets "Schematic Supply Nets_4" [InNet('VBUS_SW')] p5: voltage=0.000
SupplyNets "Schematic Supply Nets_3" [InNet('+3V3')] p6: voltage=0.000
SupplyNets "Schematic Supply Nets_2" [InNet('GND')] p7: voltage=0.000
SupplyNets "Schematic Supply Nets_1" [InNet('CHS')] p8: voltage=0.000
SupplyNets "Schematic Supply Nets" [InNet('+V_BATT')] p9: voltage=0.000
Width "Width Power" [InNetClass('POWER')] p1: maxlimit=984.25 minlimit=5.91 preferedwidth=11.81 // High-current nets
Width [All] p2: maxlimit=984.25 minlimit=5.91 preferedwidth=5.91 // JLCPCB 2 oz multilayer minimum 0.15 mm
20 further rules are at their usual default settings.

## Classes and differential pairs
net class HV: +V_BATT BAT_SENSE BAT_SRC BQ_ACN BQ_ACP BQ_BTST1 BQ_BTST2 BQ_HIDRV1 BQ_HIDRV2 BQ_SRN BQ_SRP BQ_SW1 BQ_SW2 LM_GATE LM_VCAP LTC_GATE LTC_GATE_RC LTC_SENSE LTC_VOUT TPD_VBIAS V_BAT V_FUSED V_SYS VAC VAUX_IN VBUS VBUS_CS VBUS_SW
net class POWER: +V_BATT BAT_SENSE BAT_SRC BQ_SW1 BQ_SW2 V_BAT V_FUSED V_SYS VAC VAUX_IN VBUS VBUS_CS VBUS_SW
component class AUX_POWER: C58 C59 C60 C61 C62 C63 C64 D10 D11 U10 U11
component class MONITOR_MCU: C53 C54 C55 C56 C57 C66 D12 D13 PN1 R4 R5 R6 R34 R35 R36 R37 R38 R39 R44 SW1 U7 U8 U9
component class USBC_PD: C40 C41 C42 C43 C44 C45 C46 C47 C48 C49 C50 C51 C52 D9 J3 Q7 Q8 R28 R29 R30 R31 R32 R33 R42 U3 U4 U5 U6
component class POWER_STAGE: C1 C2 C3 C4 C5 C6 C7 C8 C9 C10 C11 C12 C13 C14 C15 C16 C17 C18 C19 C20 C21 C22 C23 C24 C25 C26 C27 C29 C30 C31 C32 C33 C34 C35 C36 C37 C38 C39 D3 D4 D5 D6 D7 D8 L1 Q3 Q4 Q5 Q6 R3 R7 R13 R14 R15 R16 R17 R18 R19 R20 R21 R22 R23 R24 R25 R26 R27 U2
component class BATTERY: C28 C65 D1 D2 F1 Q1 Q2 R1 R8 R9 R10 R11 R12 R40 R41 U1
component class 00_Top: J1 J2 MH1 MH2 MH3 MH4 MH5 MH6 R43

## Components (designator, comment, footprint, x,y, rotation, side; value= is the part's Value field where it differs from the comment)
C1 "100µF 80V" CAPAE1030X1280N 2496.06,2023.62 r90 top
C2 "100µF 80V" CAPAE1030X1280N 2496.06,1492.13 r270 top
C3 "10 µF, 100V" CAPC3225X30N 2708.66,1826.77 r0 bottom
C4 "10 µF, 100V" CAPC3225X30N 2708.66,1696.85 r0 bottom
C5 "10 µF, 100V" CAPC3225X30N 2708.66,1566.93 r0 bottom
C6 "10 µF, 100V" CAPC3225X30N 2708.66,1437.01 r0 bottom
C7 "10 µF, 100V" CAPC3225X30N 2511.81,1826.77 r180 bottom
C8 "10 µF, 100V" CAPC3225X30N 2511.81,1696.85 r180 bottom
C9 "10 µF, 100V" CAPC3225X30N 2511.81,1566.93 r180 bottom
C10 "10 µF, 100V" CAPC3225X30N 2511.81,1437.01 r180 bottom
C11 "100µF 80V" CAPAE1030X1280N 2535.43,2594.49 r0 top
C12 "10 µF, 100V" CAPC3225X30N 3858.27,1826.77 r180 bottom
C13 "10 µF, 100V" CAPC3225X30N 3858.27,1696.85 r180 bottom
C14 "10 µF, 100V" CAPC3225X30N 3858.27,1566.93 r180 bottom
C15 "10 µF, 100V" CAPC3225X30N 4055.12,1826.77 r0 bottom
C16 "10 µF, 100V" CAPC3225X30N 4055.12,1696.85 r0 bottom
C17 "10 µF, 100V" CAPC3225X30N 4055.12,1566.93 r0 bottom
C18 "100µF 80V" CAPAE1030X1280N 3972.44,1531.5 r270 top
C19 "100µF 80V" CAPAE1030X1280N 4129.92,2082.68 r0 top
C20 "0.1 µF, 100V" CAPC1608X10N 2899.61,1470.47 r90 bottom
C21 "10000 pF, 100V" CAPC1608X10N 2958.66,1470.47 r90 bottom
C22 "0.1 µF, 100V" CAPC1608X10N 3017.72,1470.47 r90 bottom
C23 "10000 pF, 100V" CAPC1608X10N 3076.77,1470.47 r90 bottom
C24 "0.1 µF, 100V" CAPC1608X10N 3490.16,2066.93 r270 bottom
C25 "10000 pF, 100V" CAPC1608X10N 3549.21,2066.93 r270 bottom
C26 "0.1 µF, 100V" CAPC1608X10N 3608.27,2066.93 r270 bottom
C27 "10000 pF, 100V" CAPC1608X10N 3667.32,2066.93 r270 bottom
C28 "0.047 µF, 100V" CAPC1608X10N 4366.14,2535.83 r180 bottom
C29 "0.1 µF, 100V" CAPC1608X10N 3031.5,2200.79 r90 bottom
C30 "0.1 µF, 100V" CAPC1608X10N 3031.5,2086.61 r90 bottom
C31 "0.1 µF, 100V" CAPC1608X10N 3606.3,2181.1 r180 bottom
C32 "0.1 µF, 100V" CAPC1608X10N 3606.3,2255.91 r180 bottom
C33 "470nF" CAPC1608X10N 3102.36,2141.73 r90 bottom
C34 "470nF" CAPC1608X10N 3476.38,2212.6 r180 bottom
C35 "1µF" CAPC3216X20N 2948.82,2240.16 r90 bottom
C36 "4.7 µF, 25V" CAPC1608X10N 3253.94,1944.88 r90 bottom
C37 "4.7 µF, 25V" CAPC1608X10N 3312.99,1944.88 r90 bottom
C38 "1µF" CAPC1608X10N 3161.42,1988.19 r0 bottom
C39 "1µF" CAPC1608X10N 3405.51,1988.19 r180 bottom
C40 "0.1 µF, 100V" CAPC1608X10N 1450.79,1944.88 r180 bottom
C41 "0.1 µF, 100V" CAPC1608X10N 1659.45,2653.54 r90 top
C42 "1µF" CAPC1608X10N 1527.56,1812.99 r90 top
C43 "100nF" CAPC1608X10N 1413.39,2062.99 r0 top
C44 "100nF" CAPC1608X10N 1659.45,2535.43 r90 top
C45 "4.7 µF, 25V" CAPC2012X15N 1576.77,1769.68 r0 bottom
C46 "100nF" CAPC1608X10N 1803.15,1935.04 r270 top
C47 "10µF" CAPC2012X15N 1653.54,1860.24 r0 bottom
C48 "10µF" CAPC2012X15N 1850.39,1519.68 r180 top
C49 "10µF" CAPC2012X15N 1732.28,1927.17 r270 top
C50 "220 pF, 50V" CAPC1005X06N 1891.73,1803.15 r180 top
C51 "220 pF, 50V" CAPC1005X06N 1854.33,1901.57 r270 top
C52 "100nF" CAPC1005X06N 1590.55,1570.87 r0 top
C53 "100nF" CAPC1005X06N 3862.2,2165.35 r90 bottom
C54 "100nF" CAPC1005X06N 2151.57,1925.2 r0 top
C55 "100nF" CAPC1005X06N 1551.18,3401.57 r90 top
C56 "10µF" CAPC2012X15N 1620.08,3362.2 r90 top
C57 "1µF" CAPC1608X10N 1629.92,3224.41 r90 top
C58 "0.1 µF, 100V" CAPC1608X10N 3814.96,3568.9 r0 top
C59 "2.2 µF, 100V" CAPC3216X20N 3657.48,3588.58 r180 top
C60 "1µF" CAPC1608X10N 3814.96,3637.8 r0 top
C61 "22 µF, 25V" CAPC3225X30N 3460.63,3608.27 r0 top
C62 "22 µF, 25V" CAPC3225X30N 3657.48,3706.69 r0 top
C63 "1µF" CAPC1608X10N 3982.28,3568.9 r0 top
C64 "1µF" CAPC1608X10N 4100.39,3568.9 r0 top
C65 "100nF" CAPC1608X10N 4606.3,2326.77 r270 bottom
C66 "100nF" CAPC1005X06N 2984.25,3194.88 r0 top
D1 "SMBJ60A" SMB 3952.76,3086.61 r0 top
D2 "SMBJ60A" SMB 4307.09,1716.54 r90 top
D3 "BZX384C5V6-G3-08" NXP-SOD323 3149.61,1921.26 r180 bottom
D4 "BZX384C5V6-G3-08" NXP-SOD323 3417.32,1921.26 r0 bottom
D5 "PMEG10030ELPX" ST-SOD128FLAT 2988.19,1346.46 r180 bottom
D6 "PMEG10030ELPX" ST-SOD128FLAT 2988.19,1220.47 r180 bottom
D7 "PMEG10030ELPX" ST-SOD128FLAT 3324.8,1527.56 r270 bottom
D8 "PMEG10030ELPX" ST-SOD128FLAT 3442.91,1527.56 r270 bottom
D9 "SMBJ54A" SMB 1433.07,2299.21 r0 top
D10 "PMEG10030ELPX" ST-SOD128FLAT 3362.2,3480.32 r0 top
D11 "PMEG10030ELPX" ST-SOD128FLAT 3362.2,3322.83 r0 top
D12 "MMSD4148T1G" SOD3716X135N 3248.03,3216.54 r0 top
D13 "IN-PI33TBTPRPGPB" LED_RGB_3535_ADDR 3047.24,3094.49 r0 top
F1 "30A" FUSE_BEL_0678H_3912 4110.24,2870.08 r180 top
J1 "7460408" "7460408_HAL Surface" 4641.73,2968.5 r0 top
J2 "7460408" "7460408_HAL Surface" 4641.73,1629.92 r0 top
J3 "USB4105-GF-A" GCT_USB4105-GF-A 1090.55,1944.88 r270 top
L1 "7uH" WE-HCF_2013 3283.46,2102.36 r0 top
MH1 "Mounting-Hole" MH3.0x7.6 1177.17,1177.17 r0 top
MH2 "Mounting-Hole" MH3.0x7.6 4681.1,1177.17 r0 top
MH3 "Mounting-Hole" MH3.0x7.6 1177.17,3657.48 r0 top
MH4 "Mounting-Hole" MH3.0x7.6 4681.1,3657.48 r0 top
MH5 "Mounting-Hole" MH3.0x7.6 3283.46,1216.54 r0 top
MH6 "Mounting-Hole" MH3.0x7.6 3598.43,2771.65 r0 top
PN1 "TC2030" TC2030-MCP-NL-SINGLE 2496.06,3283.46 r0 top
Q1 "ISC022N10NM6ATMA1" INF-PG-TSON-8-3 4129.92,2539.37 r180 bottom
Q2 "ISC022N10NM6ATMA1" INF-PG-TSON-8-3 4129.92,2259.84 r0 bottom
Q3 "EPC2302" TRANS_EPC2302 2988.19,1647.64 r270 bottom
Q4 "EPC2302" TRANS_EPC2302 2988.19,1889.76 r270 bottom
Q5 "EPC2302" TRANS_EPC2302 3578.74,1889.76 r90 bottom
Q6 "EPC2302" TRANS_EPC2302 3578.74,1647.64 r90 bottom
Q7 "BSZ097N10NS5ATMA1" TRANS_PG-TSDSON-8 1669.29,2299.21 r180 top
Q8 "BSZ097N10NS5ATMA1" TRANS_PG-TSDSON-8 1866.14,2299.21 r0 top
R1 "1.5m" WSL3637 4453.15,2062.99 r0 bottom
R3 "5m" 2512-L-4T 4307.09,1688.98 r0 bottom
R4 "NTC 10K" RESC1608X06N 3283.46,1803.15 r90 bottom
R5 "NTC 10K" RESC1608X06N 3795.28,2102.36 r90 top
R6 "NTC 10K" RESC1608X06N 3944.88,2397.64 r270 bottom
R7 "5m" 2512-L-4T 2102.36,2299.21 r90 top
R8 "953 kOhms" RESC1005X04N 4496.06,2505.91 r180 bottom
R9 "46.4 kOhms" RESC1005X04N 4535.43,2437.01 r270 bottom
R10 "8.66 kOhms" RESC1005X04N 4545.28,2348.43 r270 bottom
R11 "10 kOhms" RESC1005X04N 2594.49,3494.09 r0 top
R12 "1k" RESC1005X04N 4290.16,2517.72 r270 bottom
R13 "732 kOhms" RESC1005X04N 3094.49,2234.25 r0 bottom
R14 "237 kOhms" RESC1005X04N 3122.05,2289.37 r270 bottom
R15 "22.6 kOhms" RESC1005X04N 3059.06,2309.06 r0 bottom
R16 "133 kOhms" RESC1005X04N 3122.05,2358.27 r270 bottom
R17 "2.49 kOhms" RESC1005X04N 3372.05,2403.54 r270 bottom
R18 "3.83 kOhms" RESC1005X04N 3425.2,2375.98 r270 bottom
R19 "5.23 kOhms" RESC1005X04N 3444.88,2464.57 r90 bottom
R20 "30.1 kOhms" RESC1005X04N 3401.57,2464.57 r270 bottom
R21 "100k" RESC1005X04N 3110.24,2586.61 r0 bottom
R22 "324 kOhms" RESC1608X06N 3503.94,2429.13 r90 bottom
R23 "9.53 kOhms" RESC1005X04N 3503.94,2342.52 r90 bottom
R24 "10 kOhms" RESC1005X04N 1917.32,1645.67 r270 top
R25 "10 kOhms" RESC1005X04N 2244.09,3177.17 r0 top
R26 "10 kOhms" RESC1005X04N 2244.09,3220.47 r0 top
R27 "10 kOhms" RESC1005X04N 2244.09,3263.78 r0 top
R28 "976 kOhms" RESC1005X04N 1600.39,2584.65 r90 top
R29 "23.2 kOhms" RESC1005X04N 1649.61,2732.28 r180 top
R30 "10 kOhms" RESC1005X04N 1669.29,1582.68 r270 top
R31 "10 kOhms" RESC1005X04N 1440.94,1767.72 r0 top
R32 "4k7" RESC1005X04N 1844.49,1602.36 r270 top
R33 "4k7" RESC1005X04N 1795.28,1602.36 r270 top
R34 "10 kOhms" RESC1005X04N 1570.87,3244.09 r90 top
R35 "4k7" RESC1005X04N 2935.04,3411.42 r0 top
R36 "4k7" RESC1005X04N 2935.04,3362.2 r0 top
R37 "10 kOhms" RESC1005X04N 2837.13,3340.55 r0 top
R38 "10 kOhms" RESC1005X04N 2935.04,3460.63 r0 top
R39 "10 kOhms" RESC1005X04N 2866.14,3411.42 r90 top
R40 "732 kOhms" RESC1005X04N 4356.3,2289.37 r0 bottom
R41 "237 kOhms" RESC1005X04N 4277.56,2289.37 r0 bottom
R42 "100k" RESC1005X04N 1531.5,2043.31 r180 top
R43 "0R" RESC1608X06N 3047.24,3149.61 r270 bottom
R44 "10 kOhms" RESC1005X04N 2488.19,3188.98 r0 top
SW1 "PTS810 SJM 250 SMTR LFS" C&K_PTS810 2811.02,3086.61 r0 top
U1 "LTC4368IDD-1#PBF" LT-DD-DFN10_3X3 4346.46,2397.64 r180 bottom
U2 "BQ25756RRVR" QFN50P500X600X100-37N 3283.46,2240.16 r270 bottom
U3 "24LC512T-I/SN" SOIC127P600X175-8N 1669.29,1393.7 r0 top
U4 "TPS26750ASRSMR" TI-S-PVQFN-N32 1748.03,1748.03 r0 top
U5 "TPD4S480RUKR" QFN40P300X300X80-21N 1480.32,1944.88 r0 top
U6 "LM74502HDDFR" SOT65P280X100-8N 1787.4,2535.43 r180 top
U7 "INA228AIDGSR" MSOP10 3771.65,2259.84 r270 bottom
U8 "INA228AIDGSR" MSOP10 2062.99,2023.62 r0 top
U9 "ESP32-C6-MINI-1-N4" ESP32-C6-MINI-1-N4 1944.88,3480.32 r0 top
U10 "TPSM365R6RDNR" TI-RDN0011A 3716.54,3401.57 r0 top
U11 "AP2112K-3.3TRG1" SOT95P280X145-5N 4031.5,3401.57 r0 top

## Footprints (in the part's own frame and the unit in brackets; to place one, negate y for a bottom-side part, rotate by r counter-clockwise, add the part's x,y. Pads: shape width x height; smd on the part's side, far side on the other; paste and mask are expansions set on the pad)
2512-L-4T [mm]
  rect 1.3x5.4 smd: 1(-1.6,-0.6) 2(1.6,-0.6)
  rect 1.3x0.7 smd: 3(-1.6,2.95) 4(1.6,2.95)
  body extent -1.61,-3.18 1.62,3.24, height 0.6
"7460408_HAL Surface" [mm] "M5, thr 6mm"
  round 2 hole 1.45: 1(-3.81,-3.81) 1(-3.81,-1.27) 1(-3.81,1.27) 1(-3.81,3.81) 1(-1.27,-3.81) 1(-1.27,3.81) 1(1.27,-3.81) 1(1.27,3.81) 1(3.81,-3.81) 1(3.81,-1.27) 1(3.81,1.27) 1(3.81,3.81)
  round 0 hole 5.3: 1(0,0)
  body extent -4.5,-4.5 4.5,4.5, height 6
C&K_PTS810 [mm] "Microminiature SMT Top Actuated"
  rect 1.05x0.65 smd: 1(-2.075,1.075) 1(2.075,1.075) 2(-2.075,-1.075) 2(2.075,-1.075)
  silkscreen extent -2.1,-1.6 2.1,1.6, body extent -2.29,-1.6 2.29,1.6, height 2.5
CAPAE1030X1280N [mm] "Aluminium hybrid polymer SMD can, 10 x 12.5 mm, base 10.3 x 10.3 mm, height 12.8 mm max (TDK B40910 layout); pad 1 = +"
  rect 4.1x2 smd: 1(-4.35,0) 2(4.35,0)
  silkscreen extent -7.4,-5.25 5.25,5.25, body extent -6.4,-1 6.4,1
CAPC1005X06N [mm] "Chip Capacitor 2-Leads, Body 1.00x0.50mm, IPC Medium Density"
  rect 0.475x0.55 smd: 1(-0.488,0) 2(0.488,0)
  body extent -0.5,-0.27 0.5,0.27, height 0.36
CAPC1608X10N [mm] "Chip Capacitor, 2-Leads, Body 1.60x0.80mm, IPC Medium Density"
  rect 0.65x0.95 smd: 1(-0.776,0) 2(0.775,0)
  body extent -0.87,-0.47 0.88,0.48, height 1
CAPC2012X15N [mm] "Chip Capacitor, 2-Leads, Body 2.00x1.25mm, IPC Medium Density"
  rect 1.3x1.45 smd: 1(-0.95,0) 2(0.95,0)
  body extent -1.1,-0.72 1.1,0.72, height 1.5
CAPC3216X20N [mm] "Chip Capacitor, 2-Leads, Body 3.20x1.6mm, IPC Medium Density"
  rect 1.25x1.7 smd: 1(-1.575,0) 2(1.575,0)
  silkscreen extent -0.6,-0.8 0.6,0.8, body extent -1.71,-0.8 1.71,0.8, height 2
CAPC3225X30N [mm] "Chip Capacitor, 2-Leads, Body 3.20x2.5mm, IPC Medium Density"
  rect 1.25x2.7 smd: 1(-1.575,0) 2(1.575,0)
  silkscreen extent -0.65,-1.25 0.65,1.25, body extent -1.71,-1.25 1.71,1.25, height 3
ESP32-C6-MINI-1-N4 [mm] "ESP32-C6-MINI-1 module 13.2x16.6x2.4mm, 53 pads, PCB antenna keep-out (Espressif land pattern)"
  rect 0.8x0.4 smd: 1(-5.9,1.3) 2(-5.9,0.5) 3(-5.9,-0.3) 4(-5.9,-1.1) 5(-5.9,-1.9) 6(-5.9,-2.7) 7(-5.9,-3.5) 8(-5.9,-4.3) 9(-5.9,-5.1) 10(-5.9,-5.9) 11(-5.9,-6.7) 25(5.9,-6.7) 26(5.9,-5.9) 27(5.9,-5.1) 28(5.9,-4.3) 29(5.9,-3.5) 30(5.9,-2.7) 31(5.9,-1.9) 32(5.9,-1.1) 33(5.9,-0.3) 34(5.9,0.5) 35(5.9,1.3)
  rect 0.4x0.8 smd: 12(-4.8,-7.6) 13(-4,-7.6) 14(-3.2,-7.6) 15(-2.4,-7.6) 16(-1.6,-7.6) 17(-0.8,-7.6) 18(0,-7.6) 19(0.8,-7.6) 20(1.6,-7.6) 21(2.4,-7.6) 22(3.2,-7.6) 23(4,-7.6) 24(4.8,-7.6) 36(4.8,2.2) 37(4,2.2) 38(3.2,2.2) 39(2.4,2.2) 40(1.6,2.2) 41(0.8,2.2) 42(0,2.2) 43(-0.8,2.2) 44(-1.6,2.2) 45(-2.4,2.2) 46(-3.2,2.2) 47(-4,2.2) 48(-4.8,2.2)
  rect 1.45x1.45 smd: 49(-1.975,-4.675) 49(-1.975,-2.7) 49(-1.975,-0.725) 49(0,-4.675) 49(0,-2.7) 49(0,-0.725) 49(1.975,-4.675) 49(1.975,-2.7) 49(1.975,-0.725)
  rect 0.7x0.7 smd: 50(5.95,2.25) 51(5.95,-7.65) 52(-5.95,-7.65) 53(-5.95,2.25)
  Keep-Out Layer region: -6.6,2.9 6.6,2.9 6.6,8.3 -6.6,8.3
  silkscreen extent -7.22,-8.4 6.7,1.42, body extent -6.3,-8 6.3,2.6
FUSE_BEL_0678H_3912 [mm] "Bel Fuse 0678H/0678L brick fuse 9.8 x 3.05 x 3.05 mm (3912), Bel recommended pad layout"
  rect 3.81x4.06 smd: 1(-4.705,0) 2(4.705,0)
  silkscreen extent -2.55,-2.3 2.55,2.3, body extent -6.61,-2.03 6.61,2.03
GCT_USB4105-GF-A [mm]
  rect 0.6x1.15 smd: A1_B12(-3.2,4.755) A4_B9(-2.4,4.755) B1_A12(3.2,4.755) B4_A9(2.4,4.755)
  rect 0.3x1.15 smd: A5(-1.25,4.755) A6(-0.25,4.755) A7(0.25,4.755) A8(1.25,4.755) B5(1.75,4.755) B6(0.75,4.755) B7(-0.75,4.755) B8(-1.75,4.755)
  oval 1.05x2.1 hole 0.6 slot 1.7 at 90 deg: S1(-4.32,4.18) S4(4.32,4.18)
  oval 1x2 hole 0.6 slot 1.4 at 90 deg: S2(-4.32,0) S3(4.32,0)
  round 0.65 hole 0.65 unplated: ""(-2.89,3.68) ""(2.89,3.68)
  silkscreen extent -4.79,-1.9 4.79,2.65, body extent -4.79,-2.6 4.79,5.11, height 3.31
INF-PG-TSON-8-3 [mm] "Infineon PG-TSON-8-3 (SuperSO8 5x6, 1.27 mm pitch), solder-mask-defined lands per Infineon footprint drawing"
  rect 0.59x0.73 smd paste-2.54 mask+0: D(-1.93,2.885) D(1.93,2.885)
  rect 0.54x0.73 smd paste-2.54 mask+0: D(-0.635,2.885) D(0.635,2.885)
  rect 4.45x3.67 smd paste-2.54 mask+0: D(0,0.685)
  rect 0.54x1 smd paste-2.54 mask+0: G(1.905,-2.75)
  rect 0.54x0.45 smd paste-2.54 mask+0: S(-1.905,-3.025) S(-0.635,-3.025) S(0.635,-3.025)
  rect 3.08x0.55 smd paste-2.54 mask+0: S(-0.635,-2.525)
  body extent -2.5,-3 2.5,3, height 1.11
LED_RGB_3535_ADDR [mm] "Addressable RGB LED, PLCC-4 3.5 x 3.5 x 1.95 mm (Inolux IN-PI33TBTPRPGPB); 1 GND, 2 DIN, 3 VDD, 4 DOUT"
  rect 1.3x0.9 smd: 1(1.59,-1.2) 2(1.59,1.2) 3(-1.59,1.2) 4(-1.59,-1.2)
  silkscreen extent -1.85,-1.85 1.85,1.85, body extent -1.75,-1.75 1.75,1.75, height 1.95
LT-DD-DFN10_3X3 [mm] "SON, 10-Leads, Body 3.55x3.55mm, Pitch 0.50mm, Thermal Pad 2.38x1.58mm, IPC Medium Density"
  rect 0.7x0.25 smd: 1(-1.425,1) 2(-1.425,0.5) 3(-1.425,0) 4(-1.425,-0.5) 5(-1.425,-1) 6(1.425,-1) 7(1.425,-0.5) 8(1.425,0) 9(1.425,0.5) 10(1.425,1)
  rect 1.58x2.38 smd: 11(0,0)
  silkscreen extent -2.4,1.9 -2.3,2, body extent -1.85,-1.8 1.85,1.8, height 0.8
MH3.0x7.6 [mm] "M3.0 Mounting Hole 3.3mm x 7.3mm"
  round 7.4 hole 3.3: 1(0,0)
MSOP10 [mm] "Mini small outline package"
  rect 1.4x0.3 smd: 1(-2.2,1) 2(-2.2,0.5) 3(-2.2,0) 4(-2.2,-0.5) 5(-2.2,-1) 6(2.2,-1) 7(2.2,-0.5) 8(2.2,0) 9(2.2,0.5) 10(2.2,1)
  silkscreen extent -1.5,-1.5 1.5,1.5, body extent -2.45,-1.5 2.45,1.5, height 1.15
NXP-SOD323 [mm] "NXP SOD323"
  rect 0.75x0.5 smd: A(1.2,0) K(-1.2,0)
  body extent -1.3,-0.7 1.3,0.7, height 1
QFN40P300X300X80-21N [mm] "WQFN, 20-Leads, Body 3.00x3.00mm, Pitch 0.40mm, Thermal Pad 1.70x1.70mm (TI RUK0020B)"
  oval 0.6x0.2 smd: 1(-1.4,0.8) 2(-1.4,0.4) 3(-1.4,0) 4(-1.4,-0.4) 5(-1.4,-0.8) 11(1.4,-0.8) 12(1.4,-0.4) 13(1.4,0) 14(1.4,0.4) 15(1.4,0.8)
  oval 0.2x0.6 smd: 6(-0.8,-1.4) 7(-0.4,-1.4) 8(0,-1.4) 9(0.4,-1.4) 10(0.8,-1.4) 16(0.8,1.4) 17(0.4,1.4) 18(0,1.4) 19(-0.4,1.4) 20(-0.8,1.4)
  rect 1.7x1.7 smd paste-2.54: 21(0,0)
  body extent -1.7,-1.7 1.7,1.7
QFN50P500X600X100-37N [mm] "VQFN, 36-Leads, Body 5.00x6.00mm, Pitch 0.50mm, Thermal Pad 3.60x4.60mm (TI RRV0036A)"
  oval 0.6x0.25 smd: 1(-2.4,2.25) 2(-2.4,1.75) 3(-2.4,1.25) 4(-2.4,0.75) 5(-2.4,0.25) 6(-2.4,-0.25) 7(-2.4,-0.75) 8(-2.4,-1.25) 9(-2.4,-1.75) 10(-2.4,-2.25) 19(2.4,-2.25) 20(2.4,-1.75) 21(2.4,-1.25) 22(2.4,-0.75) 23(2.4,-0.25) 24(2.4,0.25) 25(2.4,0.75) 26(2.4,1.25) 27(2.4,1.75) 28(2.4,2.25)
  oval 0.25x0.6 smd: 11(-1.75,-2.9) 12(-1.25,-2.9) 13(-0.75,-2.9) 14(-0.25,-2.9) 15(0.25,-2.9) 16(0.75,-2.9) 17(1.25,-2.9) 18(1.75,-2.9) 29(1.75,2.9) 30(1.25,2.9) 31(0.75,2.9) 32(0.25,2.9) 33(-0.25,2.9) 34(-0.75,2.9) 35(-1.25,2.9) 36(-1.75,2.9)
  rect 3.6x4.6 smd paste-2.54: 37(0,0)
  body extent -2.5,-3 2.5,3, height 0.91
RESC1005X04N [mm] "Chip Resistor, 2-Leads, Body 1.00x0.50mm, IPC Medium Density"
  rect 0.525x0.55 smd: 1(-0.463,0) 2(0.463,0)
  body extent -0.58,-0.28 0.58,0.28, height 0.41
RESC1608X06N [mm] "Chip Resistor, 2-Leads, Body 1.60x0.85mm, IPC Medium Density"
  rect 0.65x0.95 smd: 1(-0.776,0) 2(0.775,0)
  body extent -0.85,-0.4 0.85,0.4, height 0.56
SMB [mm]
  rect 1.52x2.3 smd: A(-2.14,0) K(2.14,0)
  silkscreen extent -2.7,-1.8 2.7,1.8, body extent -2.7,-1.8 2.7,1.8, height 2.3
SOD3716X135N [mm]
  rect 1.12x0.8 smd: A(1.73,0) K(-1.73,0)
  silkscreen extent -1.86,-0.9 1.35,0.99, body extent -1.84,-0.8 1.84,0.8, height 1.35
SOIC127P600X175-8N [mm] "SOIC, 8-Leads, Body 4.90x3.90mm, Pitch 1.27mm, IPC Medium Density"
  rect 0.6x1.55 smd paste-0.05: 1(-1.905,-2.7) 2(-0.635,-2.7) 3(0.635,-2.7) 4(1.905,-2.7) 5(1.905,2.7) 6(0.635,2.7) 7(-0.635,2.7) 8(-1.905,2.7)
  silkscreen extent -2.88,-2.82 2.5,1.6, body extent -2.5,-3 2.5,3, height 1.75
SOT65P280X100-8N [mm]
  rrect50% 0.4x1.22 smd mask+0.07: 1(-0.975,-1.31)
  rect 0.4x1.22 smd mask+0.07: 2(-0.325,-1.31) 3(0.325,-1.31) 4(0.975,-1.31) 5(0.975,1.31) 6(0.325,1.31) 7(-0.325,1.31) 8(-0.975,1.31)
  silkscreen extent -2,-0.8 1.5,0.8, body extent -1.6,-0.9 1.6,0.9, height 1
SOT95P280X145-5N [mm]
  rrect50% 1.21x0.59 smd: 1(-1.255,0.95) 2(-1.255,0) 3(-1.255,-0.95) 4(1.255,-0.95) 5(1.255,0.95)
  silkscreen extent -2.51,-1.45 0.8,1.45, body extent -1.4,-1.45 1.4,1.45, height 1.45
ST-SOD128FLAT [mm] "SODFL, 2-Leads, Body 2.40x4.70mm, IPC Medium Density"
  rect 1.4x2.1 smd: A(2.2,0) K(-2.2,0)
  silkscreen extent -1.3,-1.35 1.25,1.35, body extent -2.35,-1.25 2.35,1.25, height 1.03
TC2030-MCP-NL-SINGLE [mm] "Tag-Connect 6-pin header"
  round 0.8 smd paste-1 mask+0.07: 1(1.27,-0.635) 2(1.27,0.635) 3(2.54,-0.635) 4(2.54,0.635) 5(3.81,-0.635) 6(3.81,0.635)
  round 1 hole 1 unplated mask+0.1: MP(0,0) MP(5.08,-1.016) MP(5.08,1.016)
TI-RDN0011A [mm] "QFN-FCMOD, 11-Pin, 3.50x4.50x2.00mm power module (TI RDN0011A, TPSM365Rx)"
  rrect20% 1.1x0.375 smd: 1(-1.4,1.963) 8(1.4,1.963)
  rrect20% 1.1x0.25 smd: 2(-1.4,1.15) 3(-1.4,0.65) 6(1.4,0.65) 7(1.4,1.15)
  rrect20% 0.45x0.25 smd: 4(-1.725,-1.8) 4(-1.725,-1.3) 4(-1.725,-0.8) 4(-1.725,-0.3) 5(1.725,-1.8) 5(1.725,-1.3) 5(1.725,-0.8) 5(1.725,-0.3)
  rrect20% 1.1x2.05 smd: 4(-1,-1) 5(1,-1)
  rrect20% 0.25x0.8 smd: 9(0.5,2.05) 11(-0.5,2.05)
  rrect20% 0.3x1.55 smd: 10(0,1.675)
  silkscreen extent -1.85,-2.35 1.85,-2.35, body extent -1.95,-2.02 1.95,2.45
TI-S-PVQFN-N32 [mm] "Plastic Quad Platpack No-Lead 32-pin"
  oval 0.8x0.2 smd: 1(-2,1.4) 2(-2,1) 3(-2,0.6) 4(-2,0.2) 5(-2,-0.2) 6(-2,-0.6) 7(-2,-1) 8(-2,-1.4) 17(2,-1.4) 18(2,-1) 19(2,-0.6) 20(2,-0.2) 21(2,0.2) 22(2,0.6) 23(2,1) 24(2,1.4)
  oval 0.2x0.8 smd: 9(-1.4,-2) 10(-1,-2) 11(-0.6,-2) 12(-0.2,-2) 13(0.2,-2) 14(0.6,-2) 15(1,-2) 16(1.4,-2) 25(1.4,2) 26(1,2) 27(0.6,2) 28(0.2,2) 29(-0.2,2) 30(-0.6,2) 31(-1,2) 32(-1.4,2)
  rect 2.8x2.8 smd: 33(0,0)
  silkscreen extent -3,-2.22 2.23,2.22, body extent -2.08,-2.08 2.08,2.08, height 1
TRANS_EPC2302 [mm] "EPC2302/EPC2306 eGaN FET, 3x5mm QFN, 7 terminals, solder-mask-defined lands per EPC datasheet"
  rect 0.3x3.4 smd paste-2.54 mask+0: D(-1.275,0) D(0.425,0) S(-0.425,0) S(1.275,0)
  rect 0.4x3.4 smd paste-2.54 mask+0: D(2.175,0)
  rect 0.725x0.37 smd paste-2.54 mask+0: D(2.338,-0.975) D(2.338,-0.325) D(2.338,0.325) D(2.338,0.975) G(-2.338,0.975) S(-2.338,-0.975) S(-2.338,-0.325) S(-2.338,0.225)
  rect 0.4x0.985 smd paste-2.54 mask+0: G(-2.175,1.207)
  rect 0.4x2.1 smd paste-2.54 mask+0: S(-2.175,-0.65)
  body extent -2.5,-1.5 2.5,1.5, height 0.65
TRANS_PG-TSDSON-8 [mm]
  rect 1x1 smd paste-1 mask+0: D(0.395,0)
  rect 0.8x0.34 smd: G(-1.5,-0.975) S(-1.5,0.975) S(-1.5,-0.325) S(-1.5,0.325)
  L1 Top region: 1.9,0.805 1.25,0.805 1.25,0.495 1.9,0.495 1.9,0.155 1.25,0.155 1.25,-0.155 1.9,-0.155 1.9,-0.495 1.25,-0.495 1.25,-0.805 1.9,-0.805 1.9,-1.145 -0.46,-1.145 -0.46,1.145 1.9,1.145
  silkscreen extent -1.65,-1.65 1.65,1.65, body extent -1.7,-1.7 1.7,1.7, height 1.11
WE-HCF_2013 [mm] "Wurth WE-HCF 2013 SMT high current inductor 21.8x21.5x14.5mm; pad 3 is mechanical only"
  rect 5x5 smd: 1(-4.5,-8.5) 2(4.5,-8.5) 3(0,8.5)
  silkscreen extent -11,-11.52 11,10.85, body extent -7,-11 7,11
WSL3637 [mm] "Vishay WSL3637 4-terminal power metal strip resistor 9.14 x 9.40 mm, 0.001-0.0019 ohm lands; 1/2 current, 3/4 Kelvin"
  rect 4.27x7.345 smd: 1(-3.075,-1.282) 2(3.075,-1.282)
  rect 1.68x1.955 smd: 3(-4.37,3.978) 4(4.37,3.978)
  body extent -4.57,-4.7 4.57,4.7, height 0.64

## Part data
C1 C2 C11 C18 C19: library part B40910A0107M000, "CAP ALUM POLY HYB 100UF 80V SMD", Capacitance="100 µF", Case Code (Imperial)="Radial, Can - SMD", Manufacturer 1=TDK, Supplier Part Number 1=495-B40910A0107M000TR-ND, Temperature Coefficient=None, Tolerance=±20%, Voltage Rating="80 V", AEC-Q200=True, Manufacturer Part Number 1=B40910A0107M000, Mounting Type="Surface Mount", Part Name=B40910A0107M000, Supplier 1=Digi-Key
C3 C4 C5 C6 C7 C8 C9 C10 C12 C13 C14 C15 C16 C17: library part GRM32EC72A106ME05L, "CAP CER 10UF 100V X7S 1210", Capacitance="10 µF", Case Code (Imperial)=1210, Manufacturer 1="Murata Electronics", Supplier Part Number 1=490-GRM32EC72A106ME05LTR-ND, Temperature Coefficient=X7S, Tolerance=±20%, Voltage Rating=100V, AEC-Q200=False, Manufacturer Part Number 1=GRM32EC72A106ME05L, Mounting Type="Surface Mount, MLCC", Part Name=GRM32EC72A106ME05L, Supplier 1=Digi-Key
C20 C22 C24 C26 C29 C30 C31 C32 C40 C41 C58: library part CGA3E3X7S2A104K080AB, "CAP CER 0.1UF 100V X7S 0603", Capacitance="0.1 µF", Case Code (Imperial)=0603, Manufacturer 1=TDK, Supplier Part Number 1=445-6938-2-ND, Temperature Coefficient=X7S, Tolerance=±10%, Voltage Rating=100V, AEC-Q200=True, Manufacturer Part Number 1=CGA3E3X7S2A104K080AB, Mounting Type="Surface Mount, MLCC", Part Name=CGA3E3X7S2A104K080AB, Supplier 1=Digi-Key
C21 C23 C25 C27: library part C1608X7R2A103K080AA, "CAP CER 10000PF 100V X7R 0603", Capacitance="10000 pF", Case Code (Imperial)=0603, Manufacturer 1=TDK, Supplier Part Number 1=445-1304-2-ND, Temperature Coefficient=X7R, Tolerance=±10%, Voltage Rating=100V, AEC-Q200=False, Manufacturer Part Number 1=C1608X7R2A103K080AA, Mounting Type="Surface Mount, MLCC", Part Name=C1608X7R2A103K080AA, Supplier 1=Digi-Key
C28: library part CGA3E3X7S2A473K080AB, "CAP CER 0.047UF 100V X7S 0603", Capacitance="0.047 µF", Case Code (Imperial)=0603, Manufacturer 1=TDK, Supplier Part Number 1=445-6936-2-ND, Temperature Coefficient=X7S, Tolerance=±10%, Voltage Rating=100V, AEC-Q200=True, Manufacturer Part Number 1=CGA3E3X7S2A473K080AB, Mounting Type="Surface Mount, MLCC", Part Name=CGA3E3X7S2A473K080AB, Supplier 1=Digi-Key
C33 C34: library part CGA3E3X7R1H474K080AB, "CAP CER 0.47UF 50V X7R 0603", Capacitance="0.47 µF", Case Code (Imperial)=0603, Manufacturer 1="TDK Corporation", Supplier Part Number 1=445-175200-1-ND, Temperature Coefficient=X7R, Tolerance=±10%, Voltage Rating=50V, AEC-Q200=True, Manufacturer Part Number 1=CGA3E3X7R1H474K080AB, Mounting Type="Surface Mount, MLCC", Part Name=CGA3E3X7R1H474K080AB, Supplier 1=Digi-Key
C35: library part CGA5L2X7R2A105M160AA, "CAP CER 1UF 100V X7R 1206", Capacitance="1 µF", Case Code (Imperial)=1206, Manufacturer 1="TDK Corporation", Supplier Part Number 1=445-12901-1-ND, Temperature Coefficient=X7R, Tolerance=±20%, Voltage Rating=100V, AEC-Q200=True, Manufacturer Part Number 1=CGA5L2X7R2A105M160AA, Mounting Type="Surface Mount, MLCC", Part Name=CGA5L2X7R2A105M160AA, Supplier 1=Digi-Key
C36 C37: library part GRT188C81E475KE13D, "CAP CER 4.7UF 25V X6S 0603", Capacitance="4.7 µF", Case Code (Imperial)=0603, Manufacturer 1="Murata Electronics", Supplier Part Number 1=490-12295-2-ND, Temperature Coefficient=X6S, Tolerance=±10%, Voltage Rating=25V, AEC-Q200=True, Manufacturer Part Number 1=GRT188C81E475KE13D, Mounting Type="Surface Mount, MLCC", Part Name=GRT188C81E475KE13D, Supplier 1=Digi-Key
C38 C39 C42 C57 C60 C63 C64: library part CGA3E1X7R1C105M080AC, "CAP CER 1UF 16V X7R 0603", Capacitance="1 µF", Case Code (Imperial)=0603, Manufacturer 1="TDK Corporation", Supplier Part Number 1=445-12540-1-ND, Temperature Coefficient=X7R, Tolerance=±20%, Voltage Rating=16V, AEC-Q200=True, Manufacturer Part Number 1=CGA3E1X7R1C105M080AC, Mounting Type="0.063\" L x 0.031\" W (1.60mm x 0.80mm)", Part Name=CGA3E1X7R1C105M080AC, Supplier 1=Digi-Key
C43 C44 C46 C65: library part CGA3E2X7R1H104M080AA, "CAP CER 0.1UF 50V X7R 0603", Capacitance="0.1 µF", Case Code (Imperial)=0603, Manufacturer 1="TDK Corporation", Supplier Part Number 1=445-12561-1-ND, Temperature Coefficient=X7R, Tolerance=±20%, Voltage Rating=50V, AEC-Q200=True, Manufacturer Part Number 1=CGA3E2X7R1H104M080AA, Mounting Type="0.063\" L x 0.031\" W (1.60mm x 0.80mm)", Part Name=CGA3E2X7R1H104M080AA, Supplier 1=Digi-Key
C45: library part CGA4J1X7R1E475K125AC, "CAP CER 4.7UF 25V X7R 0805", Capacitance="4.7 µF", Case Code (Imperial)=0805, Manufacturer 1=TDK, Supplier Part Number 1=445-6967-2-ND, Temperature Coefficient=X7R, Tolerance=±10%, Voltage Rating=25V, AEC-Q200=True, Manufacturer Part Number 1=CGA4J1X7R1E475K125AC, Mounting Type="Surface Mount, MLCC", Part Name=CGA4J1X7R1E475K125AC, Supplier 1=Digi-Key
C47 C48 C49 C56: library part CGA4J1X7S1C106K125AC, "CAP CER 10UF 16V X7S 0805", Capacitance="10 µF", Case Code (Imperial)=0805, Manufacturer 1="TDK Corporation", Supplier Part Number 1=445-16110-1-ND, Temperature Coefficient=X7S, Tolerance=±10%, Voltage Rating=16V, AEC-Q200=True, Manufacturer Part Number 1=CGA4J1X7S1C106K125AC, Mounting Type="Surface Mount, MLCC", Part Name=CGA4J1X7S1C106K125AC, Supplier 1=Digi-Key
C50 C51: library part CGA2B2C0G1H221J050BA, "CAP CER 220PF 50V C0G/NP0 0402", Capacitance="220 pF", Case Code (Imperial)=0402, Manufacturer 1="TDK Corporation", Temperature Coefficient="C0G, NP0", Tolerance=±5%, Voltage Rating=50V, AEC-Q200=True, Manufacturer Part Number 1=CGA2B2C0G1H221J050BA, Mounting Type="Surface Mount, MLCC", Part Name=CGA2B2C0G1H221J050BA, Supplier 1=Digi-Key
C52 C53 C54 C55 C66: library part CGA2B1X7R1C104K050BC, "CAP CER 0.1UF 16V X7R 0402", Capacitance="0.1 µF", Case Code (Imperial)=0402, Manufacturer 1="TDK Corporation", Supplier Part Number 1=445-5613-1-ND, Temperature Coefficient=X7R, Tolerance=±10%, Voltage Rating=16V, AEC-Q200=True, Manufacturer Part Number 1=CGA2B1X7R1C104K050BC, Mounting Type="Surface Mount, MLCC", Part Name=CGA2B1X7R1C104K050BC, Supplier 1=Digi-Key
C59: library part CGA5L3X7S2A225K160AB, "CAP CER 2.2UF 100V X7S 1206", Capacitance="2.2 µF", Case Code (Imperial)=1206, Manufacturer 1="TDK Corporation", Temperature Coefficient=X7S, Tolerance=±10%, Voltage Rating=100V, AEC-Q200=True, Manufacturer Part Number 1=CGA5L3X7S2A225K160AB, Mounting Type="Surface Mount, MLCC", Part Name=CGA5L3X7S2A225K160AB, Supplier 1=Digi-Key
C61 C62: library part CGA6P3X7R1E226M250AB, "CAP CER 22UF 25V X7R 1210", Capacitance="22 µF", Case Code (Imperial)=1210, Manufacturer 1=TDK, Supplier Part Number 1=445-180363-2-ND, Temperature Coefficient=X7R, Tolerance=±20%, Voltage Rating=25V, AEC-Q200=True, Manufacturer Part Number 1=CGA6P3X7R1E226M250AB, Mounting Type="Surface Mount, MLCC", Part Name=CGA6P3X7R1E226M250AB, Supplier 1=Digi-Key
D1 D2: "TVS DIODE 60VWM 96.8VC DO214AA", Current Average=6.2A, Manufacturer 1="Littelfuse Inc.", Package / Case="DO-214AA, SMB", Supplier Device Package="DO-214AA (SMBJ)", Supplier Part Number 1=SMBJ60ALFTR-ND, Voltage Forward=-, Voltage Reverse=66.7V, AEC-Q200=False, Diode Type=Zener, Manufacturer Part Number 1=SMBJ60A, Part Name=SMBJ60A, Supplier 1=Digi-Key
D3 D4: "DIODE ZENER 5.6V 200MW SOD323", Current Average="1 µA @ 2 V", Manufacturer 1="Vishay General Semiconductor - Diodes Division", Package / Case="SC-76, SOD-323", Supplier Device Package=SOD-323, Supplier Part Number 1=BZX384C5V6-G3-08GITR-ND, Voltage Forward=-, AEC-Q200=False, Diode Type=UKNOWN, Manufacturer Part Number 1=BZX384C5V6-G3-08, Part Name=BZX384C5V6-G3-08, Supplier 1=Digi-Key, Voltage Reverse=-
D5 D6 D7 D8 D10 D11: "DIODE SCHOTTKY 100V 3A SOD128", Current Average=3A, Manufacturer 1="Nexperia USA Inc.", Package / Case=SOD-128, Supplier Device Package=SOD-128/CFP5, Supplier Part Number 1=1727-2397-1-ND, Voltage Forward="770 mV @ 3 A", Voltage Reverse="100 V", AEC-Q200=False, Diode Type=Schottky, Manufacturer Part Number 1=PMEG10030ELPX, Part Name=PMEG10030ELPX, Supplier 1=Digi-Key
D9: "TVS DIODE 54VWM 87.1VC DO214AA", Current Average=6.9A, Manufacturer 1="Littelfuse Inc.", Package / Case="DO-214AA, SMB", Supplier Device Package="DO-214AA (SMBJ)", Supplier Part Number 1=SMBJ54ALFTR-ND, Voltage Forward=-, Voltage Reverse=60V, AEC-Q200=False, Diode Type=Zener, Manufacturer Part Number 1=SMBJ54A, Part Name=SMBJ54A, Supplier 1=Digi-Key
D12: "DIODE GEN PURP 100V 200MA SOD123", Current Average=200mA, Manufacturer 1=onsemi, Package / Case=SOD-123, Supplier Part Number 1=MMSD4148T1GOSCT-ND, Voltage Forward="1 V @ 10 mA", Voltage Reverse="100 V", AEC-Q200=False, Diode Type=Standard, Manufacturer Part Number 1=MMSD4148T1G, Part Name=MMSD4148T1G, Supplier 1=Digi-Key, Supplier Device Package=SOD-123
D13: "ADDRESS LED DISCRETE SERIAL RGB", Current Average="12mA Red, 12mA Green, 12mA Blue", Manufacturer 1=Inolux, Package / Case="4-PLCC, 3535", Supplier Device Package=-, Supplier Part Number 1=1830-1208-1-ND, Voltage Forward="VDD 3.5-5.5 V", AEC-Q200=False, Diode Type="LED (addressable)", Manufacturer Part Number 1=IN-PI33TBTPRPGPB, Part Name=IN-PI33TBTPRPGPB, Supplier 1=Digi-Key, Voltage Reverse=-
F1: library part 0678H9300-02, "FUSE BRD MT 30A 250VAC 125VDC", Manufacturer 1="Bel Fuse Inc.", Supplier Part Number 1=5923-0678H9300-02TR-ND, Manufacturer Part Number 1=0678H9300-02, Part Name=0678H9300-02, Supplier 1=Digi-Key
J1 J2: "TERM REDCUBE M5 12PIN PCB", Case Style=M5Bush, Manufacturer 1="Würth Elektronik", Supplier Part Number 1=732-7460408-ND, Brand=Wurth, Brand Number=7460408, Manufacturer Part Number 1=7460408, Order Code Supplier=1821279, Part Name=7460408, Price=4,17, Supplier=Farnell, Supplier 1=Digi-Key
J3: "CONN RCP USB2.0 TYP C 24P SMD RA", Manufacturer 1=GCT, Package=None, Supplier Part Number 1=2073-USB4105-GF-ACT-ND, Availability=Unavailable, Manufacturer Part Number 1=USB4105-GF-A, MP=USB4105-GF-A, Part Name=USB4105-GF-A, Price=None, Supplier 1=Digi-Key
L1: library part 7443630700, "FIXED IND 7UH 21A 5.61 MOHM SMD", Manufacturer 1="Würth Elektronik", Supplier Part Number 1=732-2519-2-ND, Manufacturer Part Number 1=7443630700, Part Name=7443630700, Supplier 1=Digi-Key
MH1 MH2 MH3 MH4 MH5 MH6: "MOUNTING HOLE 3.0x7.6MM", Part Name=Mounting-Hole
PN1: library part TC2030-MCP-NL-SINGLE, "TAG CONNECT 2030 6 PIN", Manufacturer 1="Tag Connect", Manufacturer Part Number 1=TC2030, Part Name=TC2030-MCP-NL-SINGLE, Supplier 1=None, Supplier Part Number 1=TC2030
Q1 Q2: "TRENCH >=100V PG-TSON-8", Drain to Source Voltage (Vdss)="100 V", Manufacturer 1="Infineon Technologies", Package / Case=8-PowerTDFN, Power Dissipation (Max)="3W (Ta), 254W (Tc)", Supplier Device Package=PG-TSON-8-3, Supplier Part Number 1=448-ISC022N10NM6ATMA1TR-ND, AEC-Q200=False, FET Type=N-Channel, Manufacturer Part Number 1=ISC022N10NM6ATMA1, Part Name=ISC022N10NM6ATMA1, Supplier 1=Digi-Key, Technology="MOSFET (Metal Oxide)"
Q3 Q4 Q5 Q6: "TRANS GAN 100V DIE .0018OHM", Drain to Source Voltage (Vdss)="100 V", Manufacturer 1=EPC, Package / Case=7-PowerWQFN, Power Dissipation (Max)=-, Supplier Device Package="7-QFN (3x5)", Supplier Part Number 1=917-EPC2302TR-ND, AEC-Q200=False, FET Type=N-Channel, Manufacturer Part Number 1=EPC2302, Part Name=EPC2302, Supplier 1=Digi-Key, Technology="GaNFET (Gallium Nitride)"
Q7 Q8: "MOSFET N-CH 100V 8A/40A TSDSON", Drain to Source Voltage (Vdss)="100 V", Manufacturer 1="Infineon Technologies", Package / Case=8-PowerTDFN, Power Dissipation (Max)="2.1W (Ta), 69W (Tc)", Supplier Device Package=PG-TSDSON-8-FL, Supplier Part Number 1=BSZ097N10NS5ATMA1TR-ND, AEC-Q200=False, FET Type=N-Channel, Manufacturer Part Number 1=BSZ097N10NS5ATMA1, Part Name=BSZ097N10NS5ATMA1, Supplier 1=Digi-Key, Technology="MOSFET (Metal Oxide)"
R1: library part WSL36371L500FEA, "RES 0.0015 OHM 1% 3W 3637", Case Code (Imperial)=3637, Manufacturer 1="Vishay Dale", Power (Watts)=3W, Resistance="1.5 mOhms", Supplier Part Number 1=541-10345-1-ND, Tolerance=±1%, AEC-Q200=True, Manufacturer Part Number 1=WSL36371L500FEA, Part Name=WSL36371L500FEA, Supplier 1=Digi-Key
R3 R7: library part FC4L64R005FER, "RES 0.005 OHM 2W 2512 WIDE", Case Code (Imperial)=2512, Manufacturer 1=Ohmite, Power (Watts)=2W, Resistance="5 mOhms", Supplier Part Number 1=FC4L64R005FERCT-ND, Tolerance=±1%, AEC-Q200=False, Manufacturer Part Number 1=FC4L64R005FER, Part Name=FC4L64R005FER, Supplier 1=Digi-Key
R4 R5 R6: library part NTCS0603E3103FMT, "THERMISTOR NTC 10KOHM 3610K 0603", Case Code (Imperial)=0603, Manufacturer 1="Vishay Beyschlag/Draloric/BC Components", Power (Watts)="0.125W, 1/8W", Resistance="10 kOhms", Supplier Part Number 1=BC2472TR-ND, Tolerance=±1%, AEC-Q200=True, Manufacturer Part Number 1=NTCS0603E3103FMT, Part Name=NTCS0603E3103FMT, Supplier 1=Digi-Key
R8: library part ERJ-2RKF9533X, "RES SMD 953K OHM 1% 1/10W 0402", Case Code (Imperial)=0402, Manufacturer 1="Panasonic Industry", Power (Watts)="0.1W, 1/10W", Supplier Part Number 1=P953KLTR-ND, Tolerance=±1%, AEC-Q200=False, Manufacturer Part Number 1=ERJ-2RKF9533X, Part Name=ERJ-2RKF9533X, Resistance="953 kOhms", Supplier 1=Digi-Key
R9: library part ERJ-2RKF4642X, "RES SMD 46.4K OHM 1% 1/10W 0402", Case Code (Imperial)=0402, Manufacturer 1="Panasonic Industry", Power (Watts)="0.1W, 1/10W", Supplier Part Number 1=P46.4KLTR-ND, Tolerance=±1%, AEC-Q200=False, Manufacturer Part Number 1=ERJ-2RKF4642X, Part Name=ERJ-2RKF4642X, Resistance="46.4 kOhms", Supplier 1=Digi-Key
R10: library part ERJ-2RKF8661X, "RES SMD 8.66K OHM 1% 1/10W 0402", Case Code (Imperial)=0402, Manufacturer 1="Panasonic Industry", Power (Watts)="0.1W, 1/10W", Supplier Part Number 1=P8.66KLTR-ND, Tolerance=±1%, AEC-Q200=False, Manufacturer Part Number 1=ERJ-2RKF8661X, Part Name=ERJ-2RKF8661X, Resistance="8.66 kOhms", Supplier 1=Digi-Key
R11 R24 R25 R26 R27 R30 R31 R34 R37 R38 R39 R44: library part ERJ-2RKF1002X, "RES SMD 10K OHM 1% 1/10W 0402", Case Code (Imperial)=0402, Manufacturer 1="Panasonic Industry", Power (Watts)="0.1W, 1/10W", Supplier Part Number 1=P10.0KLTR-ND, Tolerance=±1%, AEC-Q200=False, Manufacturer Part Number 1=ERJ-2RKF1002X, Part Name=ERJ-2RKF1002X, Resistance="10 kOhms", Supplier 1=Digi-Key
R12: library part ERJ-2RKF1001X, "RES SMD 1K OHM 1% 1/10W 0402", Case Code (Imperial)=0402, Manufacturer 1="Panasonic Electronic Components", Power (Watts)="0.1W, 1/10W", Resistance="1 kOhms", Supplier Part Number 1=P1.00KLCT-ND, Tolerance=±1%, AEC-Q200=True, Manufacturer Part Number 1=ERJ-2RKF1001X, Part Name=ERJ-2RKF1001X, Supplier 1=Digi-Key
R13 R40: library part ERJ-2RKF7323X, "RES SMD 732K OHM 1% 1/10W 0402", Case Code (Imperial)=0402, Manufacturer 1="Panasonic Industry", Power (Watts)="0.1W, 1/10W", Supplier Part Number 1=P732KLTR-ND, Tolerance=±1%, AEC-Q200=False, Manufacturer Part Number 1=ERJ-2RKF7323X, Part Name=ERJ-2RKF7323X, Resistance="732 kOhms", Supplier 1=Digi-Key
R14 R41: library part ERJ-2RKF2373X, "RES SMD 237K OHM 1% 1/10W 0402", Case Code (Imperial)=0402, Manufacturer 1="Panasonic Industry", Power (Watts)="0.1W, 1/10W", Supplier Part Number 1=P237KLTR-ND, Tolerance=±1%, AEC-Q200=False, Manufacturer Part Number 1=ERJ-2RKF2373X, Part Name=ERJ-2RKF2373X, Resistance="237 kOhms", Supplier 1=Digi-Key
R15: library part ERJ-2RKF2262X, "RES SMD 22.6K OHM 1% 1/10W 0402", Case Code (Imperial)=0402, Manufacturer 1="Panasonic Industry", Power (Watts)="0.1W, 1/10W", Supplier Part Number 1=P22.6KLTR-ND, Tolerance=±1%, AEC-Q200=False, Manufacturer Part Number 1=ERJ-2RKF2262X, Part Name=ERJ-2RKF2262X, Resistance="22.6 kOhms", Supplier 1=Digi-Key
R16: library part ERJ-2RKF1333X, "RES SMD 133K OHM 1% 1/10W 0402", Case Code (Imperial)=0402, Manufacturer 1="Panasonic Industry", Power (Watts)="0.1W, 1/10W", Supplier Part Number 1=P133KLTR-ND, Tolerance=±1%, AEC-Q200=False, Manufacturer Part Number 1=ERJ-2RKF1333X, Part Name=ERJ-2RKF1333X, Resistance="133 kOhms", Supplier 1=Digi-Key
R17: library part ERJ-2RKF2491X, "RES SMD 2.49K OHM 1% 1/10W 0402", Case Code (Imperial)=0402, Manufacturer 1="Panasonic Industry", Power (Watts)="0.1W, 1/10W", Supplier Part Number 1=P2.49KLTR-ND, Tolerance=±1%, AEC-Q200=False, Manufacturer Part Number 1=ERJ-2RKF2491X, Part Name=ERJ-2RKF2491X, Resistance="2.49 kOhms", Supplier 1=Digi-Key
R18: library part ERJ-2RKF3831X, "RES SMD 3.83K OHM 1% 1/10W 0402", Case Code (Imperial)=0402, Manufacturer 1="Panasonic Industry", Power (Watts)="0.1W, 1/10W", Supplier Part Number 1=P3.83KLTR-ND, Tolerance=±1%, AEC-Q200=False, Manufacturer Part Number 1=ERJ-2RKF3831X, Part Name=ERJ-2RKF3831X, Resistance="3.83 kOhms", Supplier 1=Digi-Key
R19: library part ERJ-2RKF5231X, "RES SMD 5.23K OHM 1% 1/10W 0402", Case Code (Imperial)=0402, Manufacturer 1="Panasonic Industry", Power (Watts)="0.1W, 1/10W", Supplier Part Number 1=P5.23KLTR-ND, Tolerance=±1%, AEC-Q200=False, Manufacturer Part Number 1=ERJ-2RKF5231X, Part Name=ERJ-2RKF5231X, Resistance="5.23 kOhms", Supplier 1=Digi-Key
R20: library part ERJ-2RKF3012X, "RES SMD 30.1K OHM 1% 1/10W 0402", Case Code (Imperial)=0402, Manufacturer 1="Panasonic Industry", Power (Watts)="0.1W, 1/10W", Supplier Part Number 1=P30.1KLTR-ND, Tolerance=±1%, AEC-Q200=False, Manufacturer Part Number 1=ERJ-2RKF3012X, Part Name=ERJ-2RKF3012X, Resistance="30.1 kOhms", Supplier 1=Digi-Key
R21 R42: library part ERJ-2RKF1003X, "RES SMD 100K OHM 1% 1/10W 0402", Case Code (Imperial)=0402, Manufacturer 1="Panasonic Electronic Components", Power (Watts)="0.1W, 1/10W", Resistance="100 kOhms", Supplier Part Number 1=P100KLCT-ND, Tolerance=±1%, AEC-Q200=True, Manufacturer Part Number 1=ERJ-2RKF1003X, Part Name=ERJ-2RKF1003X, Supplier 1=Digi-Key
R22: library part ERA-3AEB3243V, "RES SMD 324K OHM 0.1% 1/10W 0603", Case Code (Imperial)=0603, Manufacturer 1="Panasonic Industry", Power (Watts)="0.1W, 1/10W", Supplier Part Number 1=P324KDBTR-ND, Tolerance=±0.1%, AEC-Q200=False, Manufacturer Part Number 1=ERA-3AEB3243V, Part Name=ERA-3AEB3243V, Resistance="324 kOhms", Supplier 1=Digi-Key
R23: library part ERA-2AEB9531X, "RES SMD 9.53KOHM 0.1% 1/16W 0402", Case Code (Imperial)=0402, Manufacturer 1="Panasonic Industry", Power (Watts)="0.063W, 1/16W", Supplier Part Number 1=P9.53KDCTR-ND, Tolerance=±0.1%, AEC-Q200=False, Manufacturer Part Number 1=ERA-2AEB9531X, Part Name=ERA-2AEB9531X, Resistance="9.53 kOhms", Supplier 1=Digi-Key
R28: library part ERJ-2RKF9763X, "RES SMD 976K OHM 1% 1/10W 0402", Case Code (Imperial)=0402, Manufacturer 1="Panasonic Industry", Power (Watts)="0.1W, 1/10W", Supplier Part Number 1=P976KLTR-ND, Tolerance=±1%, AEC-Q200=False, Manufacturer Part Number 1=ERJ-2RKF9763X, Part Name=ERJ-2RKF9763X, Resistance="976 kOhms", Supplier 1=Digi-Key
R29: library part ERJ-2RKF2322X, "RES SMD 23.2K OHM 1% 1/10W 0402", Case Code (Imperial)=0402, Manufacturer 1="Panasonic Industry", Power (Watts)="0.1W, 1/10W", Supplier Part Number 1=P23.2KLTR-ND, Tolerance=±1%, AEC-Q200=False, Manufacturer Part Number 1=ERJ-2RKF2322X, Part Name=ERJ-2RKF2322X, Resistance="23.2 kOhms", Supplier 1=Digi-Key
R32 R33 R35 R36: library part ERJ-2RKF4701X, "RES SMD 4.7K OHM 1% 1/10W 0402", Case Code (Imperial)=0402, Manufacturer 1="Panasonic Electronic Components", Power (Watts)="0.1W, 1/10W", Resistance="4.7 kOhms", Supplier Part Number 1=P4.70KLCT-ND, Tolerance=±1%, AEC-Q200=True, Manufacturer Part Number 1=ERJ-2RKF4701X, Part Name=ERJ-2RKF4701X, Supplier 1=Digi-Key
R43: library part ERJ-3GEY0R00V, "RES SMD 0 OHM JUMPER 1/10W 0603", Case Code (Imperial)=0603, Manufacturer 1="Panasonic Electronic Components", Power (Watts)="0.1W, 1/10W", Resistance="0 Ohms", Supplier Part Number 1=P0.0GCT-ND, Tolerance=Jumper, AEC-Q200=True, Manufacturer Part Number 1=ERJ-3GEY0R00V, Part Name=ERJ-3GEY0R00V, Supplier 1=Digi-Key
SW1: "SWITCH TACTILE SPST-NO 0.05A 16V", Manufacturer 1=C&K, Supplier Part Number 1=CKN10502CT-ND, Manufacturer Part Number 1="PTS810 SJM 250 SMTR LFS", Part Name="PTS810 SJM 250 SMTR LFS", Supplier 1=Digi-Key
U1: "IC SURGE SUPPRESSION ADJ 10DFN", Manufacturer 1="Analog Devices Inc.", Package / Case="10-WFDFN Exposed Pad", Supplier Device Package="10-DFN (3x3)", Supplier Part Number 1=505-LTC4368IDD-1#PBF-ND, AEC-Q200=False, Function=-, Manufacturer Part Number 1=LTC4368IDD-1#PBF, Part Name=LTC4368IDD-1#PBF, Supplier 1=Digi-Key
U2: "STAND-ALONE OR IC CONTROLLED 70-", Manufacturer 1="Texas Instruments", Package / Case="36-VFQFN Exposed Pad", Supplier Device Package="36-VQFN (5x6)", Supplier Part Number 1=296-BQ25756RRVRTR-ND, AEC-Q200=False, Function=-, Manufacturer Part Number 1=BQ25756RRVR, Part Name=BQ25756RRVR, Supplier 1=Digi-Key
U3: "IC EEPROM 512KBIT I2C 8SOIC", Manufacturer 1="Microchip Technology", Package / Case="8-SOIC (0.154\", 3.90mm Width)", Supplier Device Package=8-SOIC, Supplier Part Number 1=24LC512T-I/SNTR-ND, AEC-Q200=False, Function=-, Manufacturer Part Number 1=24LC512T-I/SN, Part Name=24LC512T-I/SN, Supplier 1=Digi-Key
U4: "CNTRLR/SW USB-C/PD3.2 32VQFN", Manufacturer 1="Texas Instruments", Package / Case="32-VFQFN Exposed Pad", Supplier Device Package="32-VQFN (4x4)", Supplier Part Number 1=296-TPS26750ASRSMRTR-ND, AEC-Q200=False, Function="USB, Type-C Controller", Manufacturer Part Number 1=TPS26750ASRSMR, Part Name=TPS26750ASRSMR, Supplier 1=Digi-Key
U5: "USB TYPE-C 48V EPR PORT PROTECTO", Manufacturer 1="Texas Instruments", Package / Case="20-WFQFN Exposed Pad", Supplier Device Package="20-WQFN (3x3)", Supplier Part Number 1=296-TPD4S480RUKRTR-ND, AEC-Q200=False, Function="USB Type C", Manufacturer Part Number 1=TPD4S480RUKR, Part Name=TPD4S480RUKR, Supplier 1=Digi-Key
U6: "3.2-V TO 65-V INDUSTRIAL RPP CON", Manufacturer 1="Texas Instruments", Package / Case="SOT-23-8 Thin, TSOT-23-8", Supplier Device Package=TSOT-23-8, Supplier Part Number 1=296-LM74502HDDFRTR-ND, AEC-Q200=False, Function="Reverse polarity / OV protection controller", Manufacturer Part Number 1=LM74502HDDFR, Part Name=LM74502HDDFR, Supplier 1=Digi-Key
U7 U8: "IC PWR MONITOR 10VSSOP", Manufacturer 1="Texas Instruments", Package / Case="10-TFSOP, 10-MSOP (0.118\", 3.00mm Width)", Supplier Device Package=10-VSSOP, Supplier Part Number 1=296-INA228AIDGSRTR-ND, AEC-Q200=False, Function="Digital Power Monitor", Manufacturer Part Number 1=INA228AIDGSR, Part Name=INA228AIDGSR, Supplier 1=Digi-Key
U9: "RF TXRX MOD BT WIFI PCB TH SMD", Manufacturer 1="Espressif Systems", Package / Case="53-SMD Module", Supplier Device Package=-, Supplier Part Number 1=1965-ESP32-C6-MINI-1-N4TR-ND, AEC-Q200=False, Function=-, Manufacturer Part Number 1=ESP32-C6-MINI-1-N4, Part Name=ESP32-C6-MINI-1-N4, Supplier 1=Digi-Key
U10: "3-V TO 65-V INPUT, 1-V TO 13-V O", Manufacturer 1="Texas Instruments", Package / Case="11-PowerVFQFN Module", Supplier Device Package="11-QFN-FCMOD (3.5x4.5)", Supplier Part Number 1=296-TPSM365R6RDNRTR-ND, AEC-Q200=False, Function="Buck power module 3-65V in, 600mA", Manufacturer Part Number 1=TPSM365R6RDNR, Part Name=TPSM365R6RDNR, Supplier 1=Digi-Key